# Altium PCB PCB-MAIN.PcbDoc (part 1 of 3)
Units mm, origin at the board's own origin, x right, y up, seen from the top; angles counter-clockwise.
Board outline 110 x 75 mm, 6 copper layers (F.Cu, In1.Cu, In2.Cu, In3.Cu, In4.Cu, B.Cu); 251 components, 186 nets, 1143 pads, 304 vias.
Unrouted connection lines stored in the file: 421.
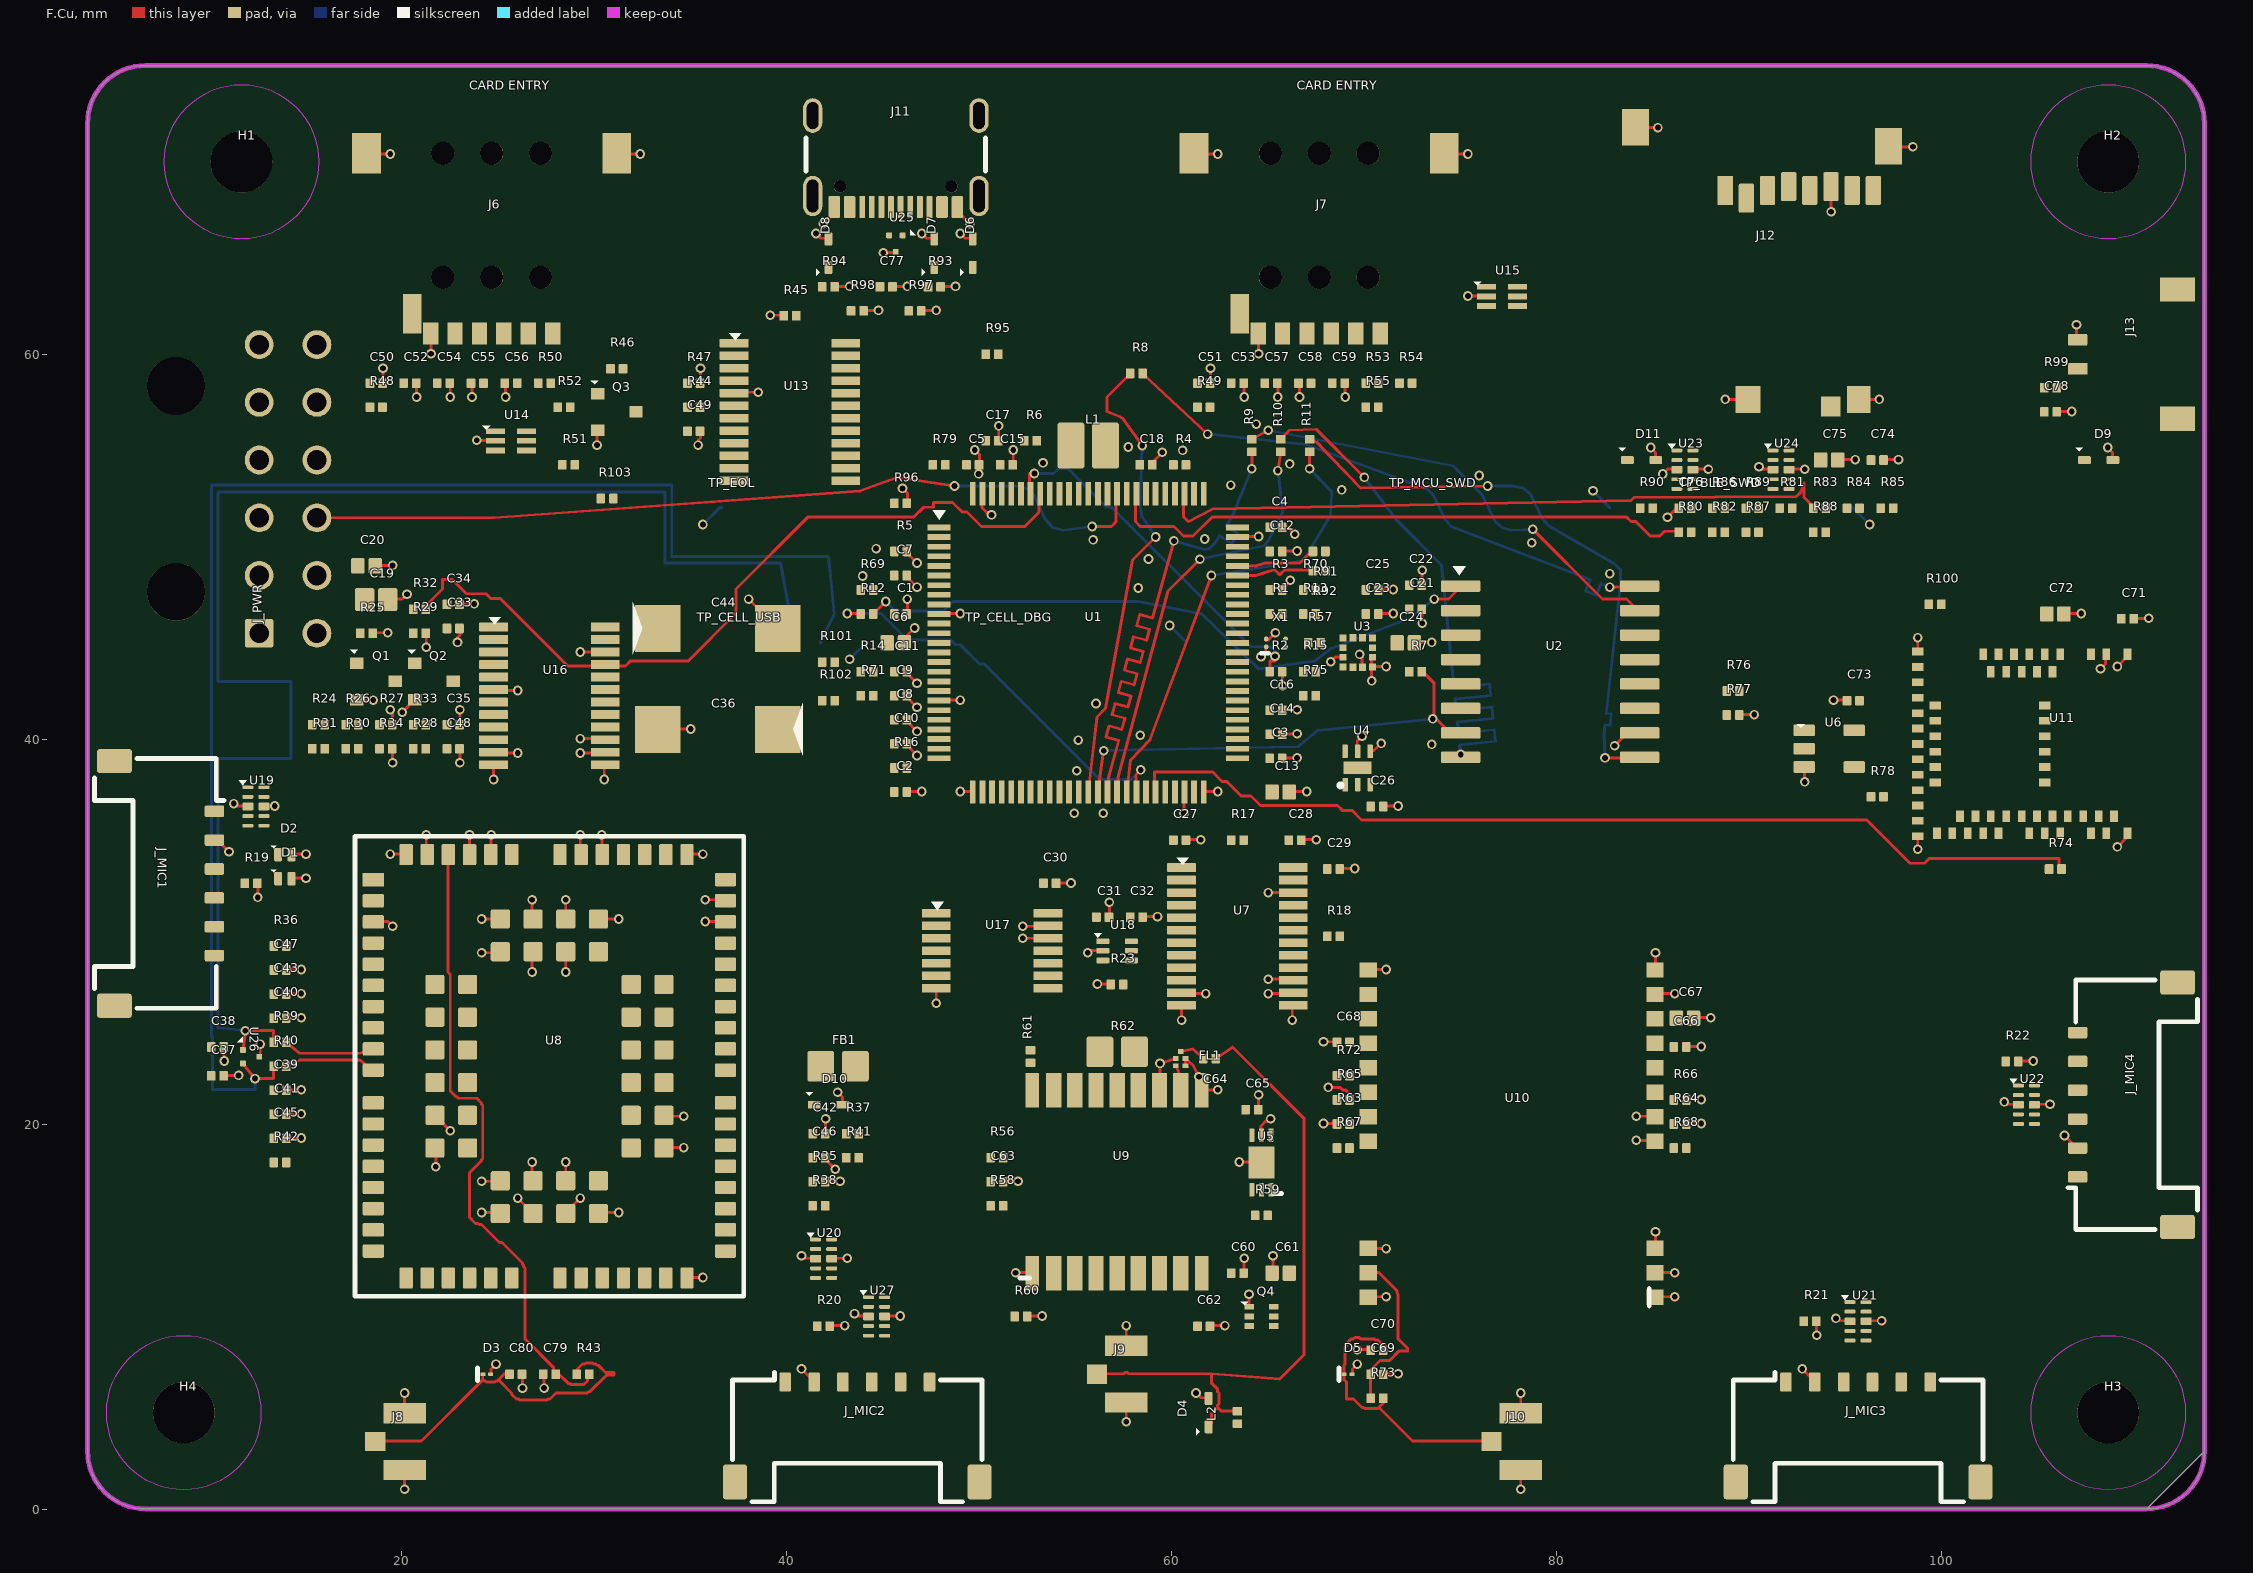
[diagram p0: F.Cu view]
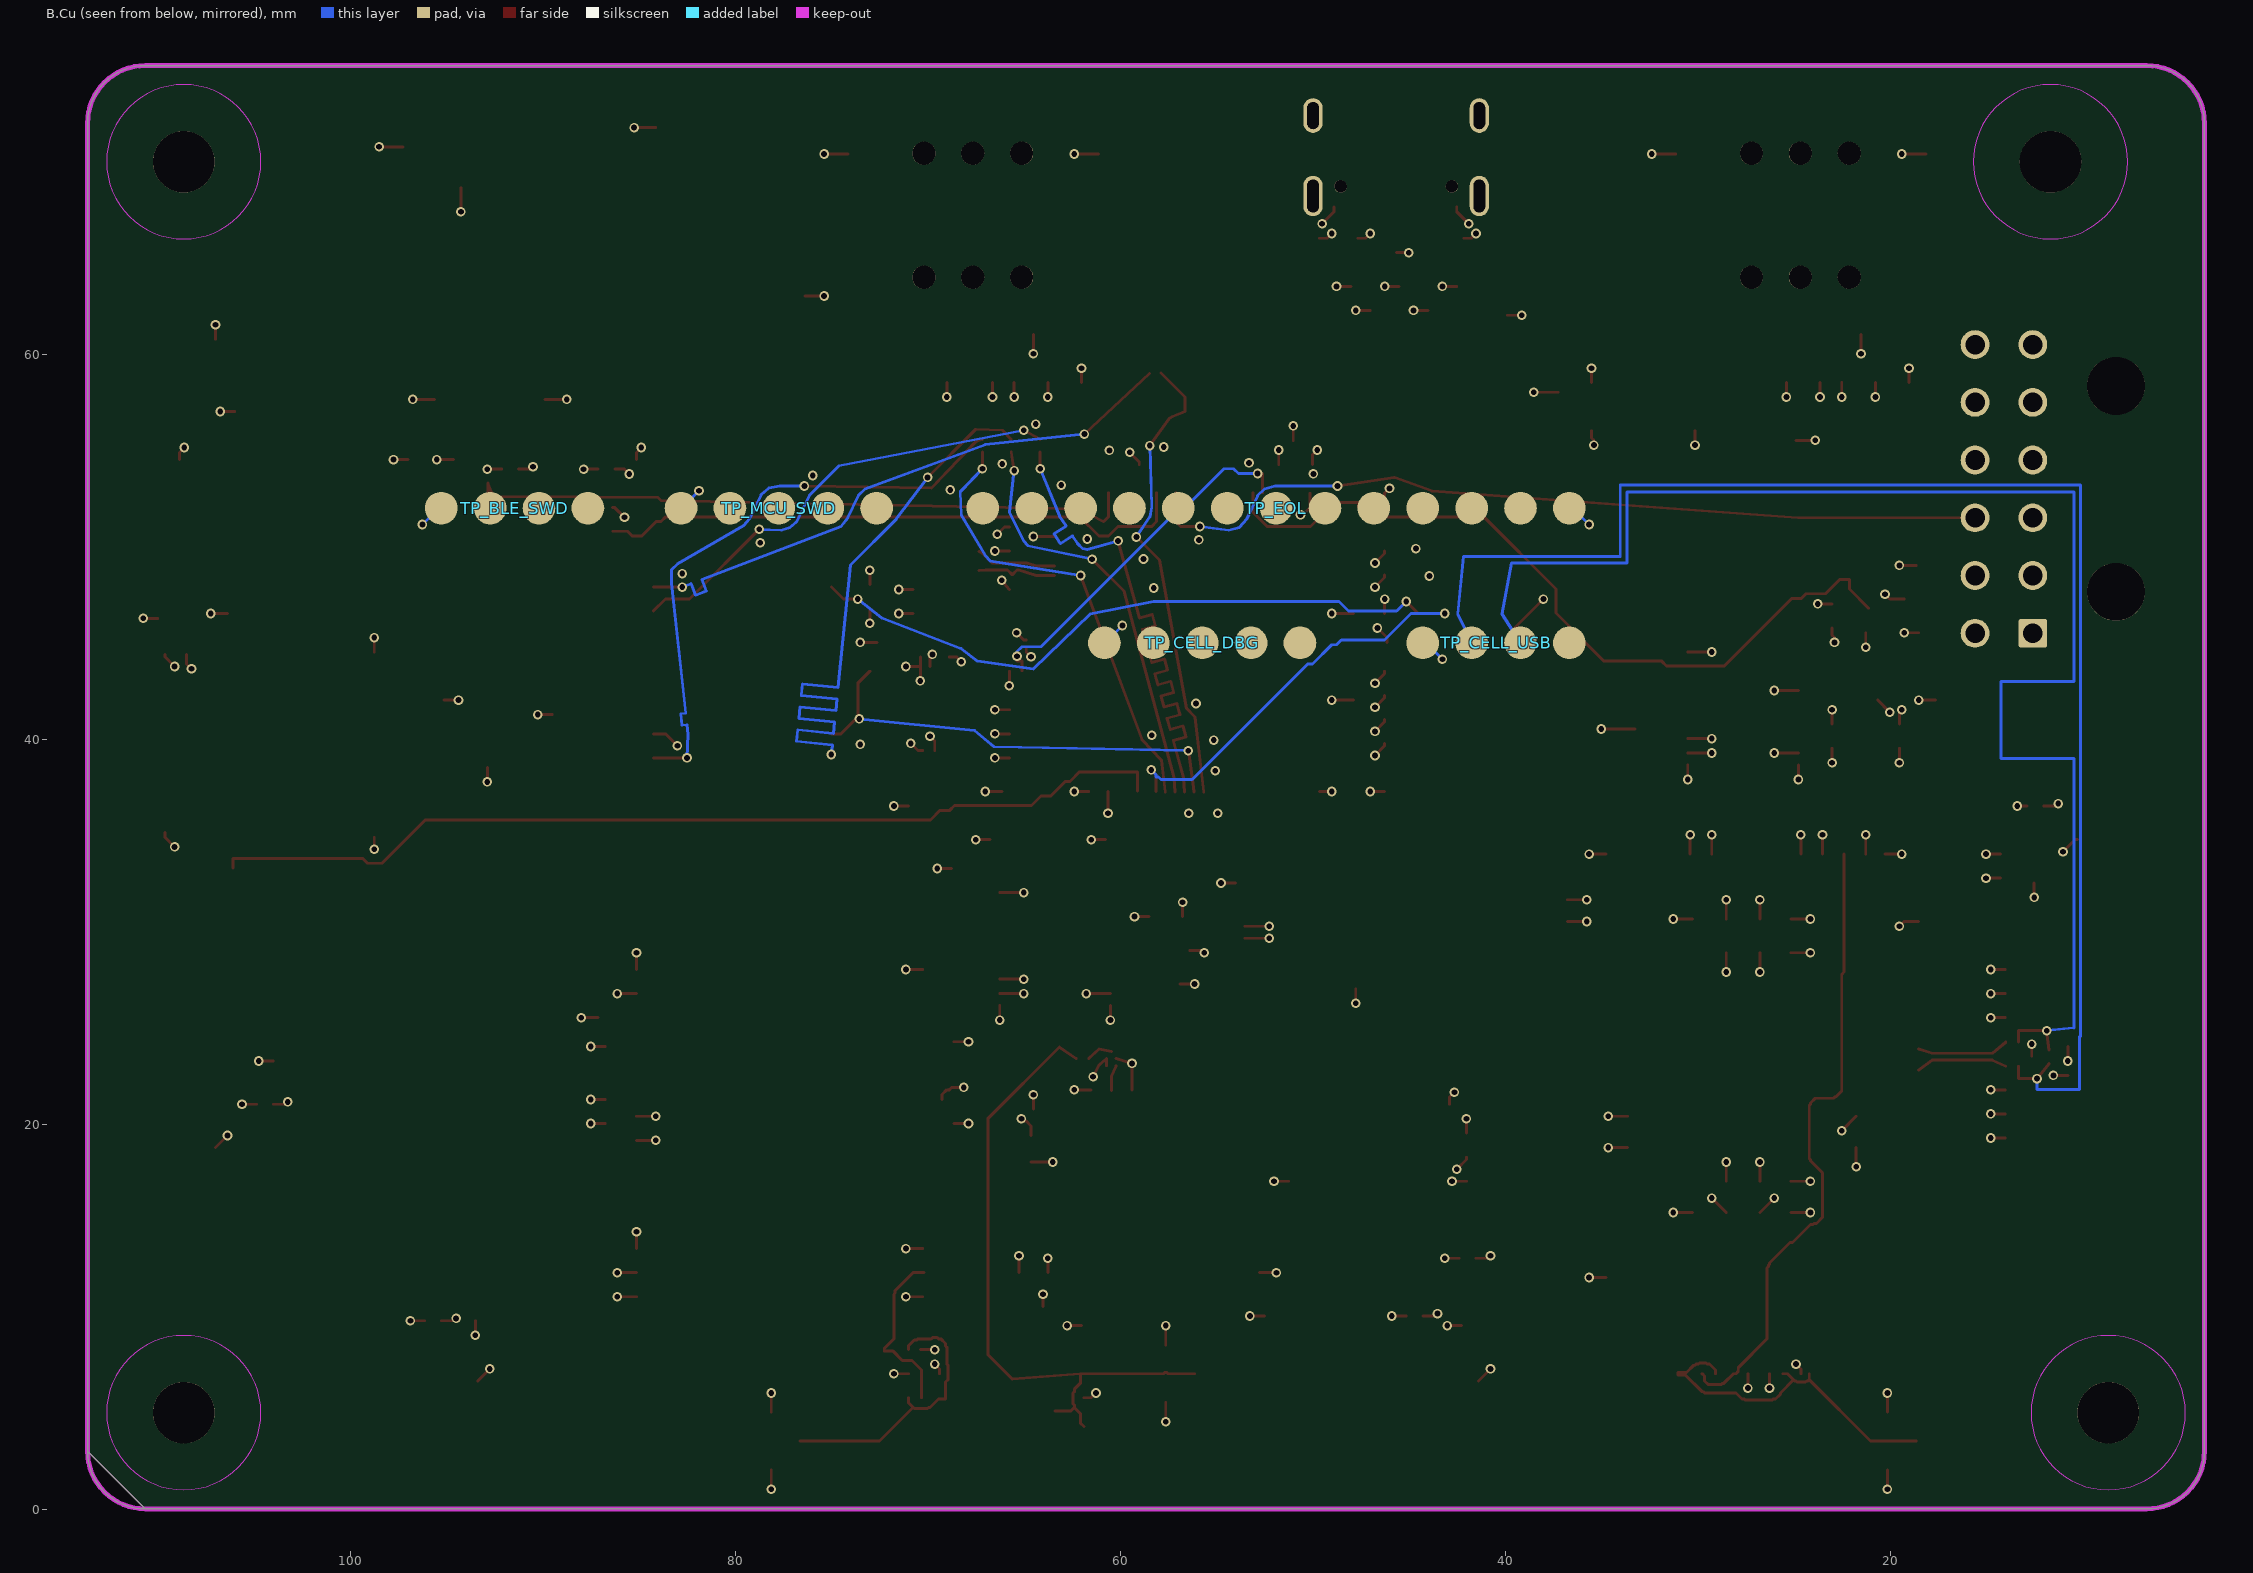
[diagram p1: B.Cu view, seen from below]
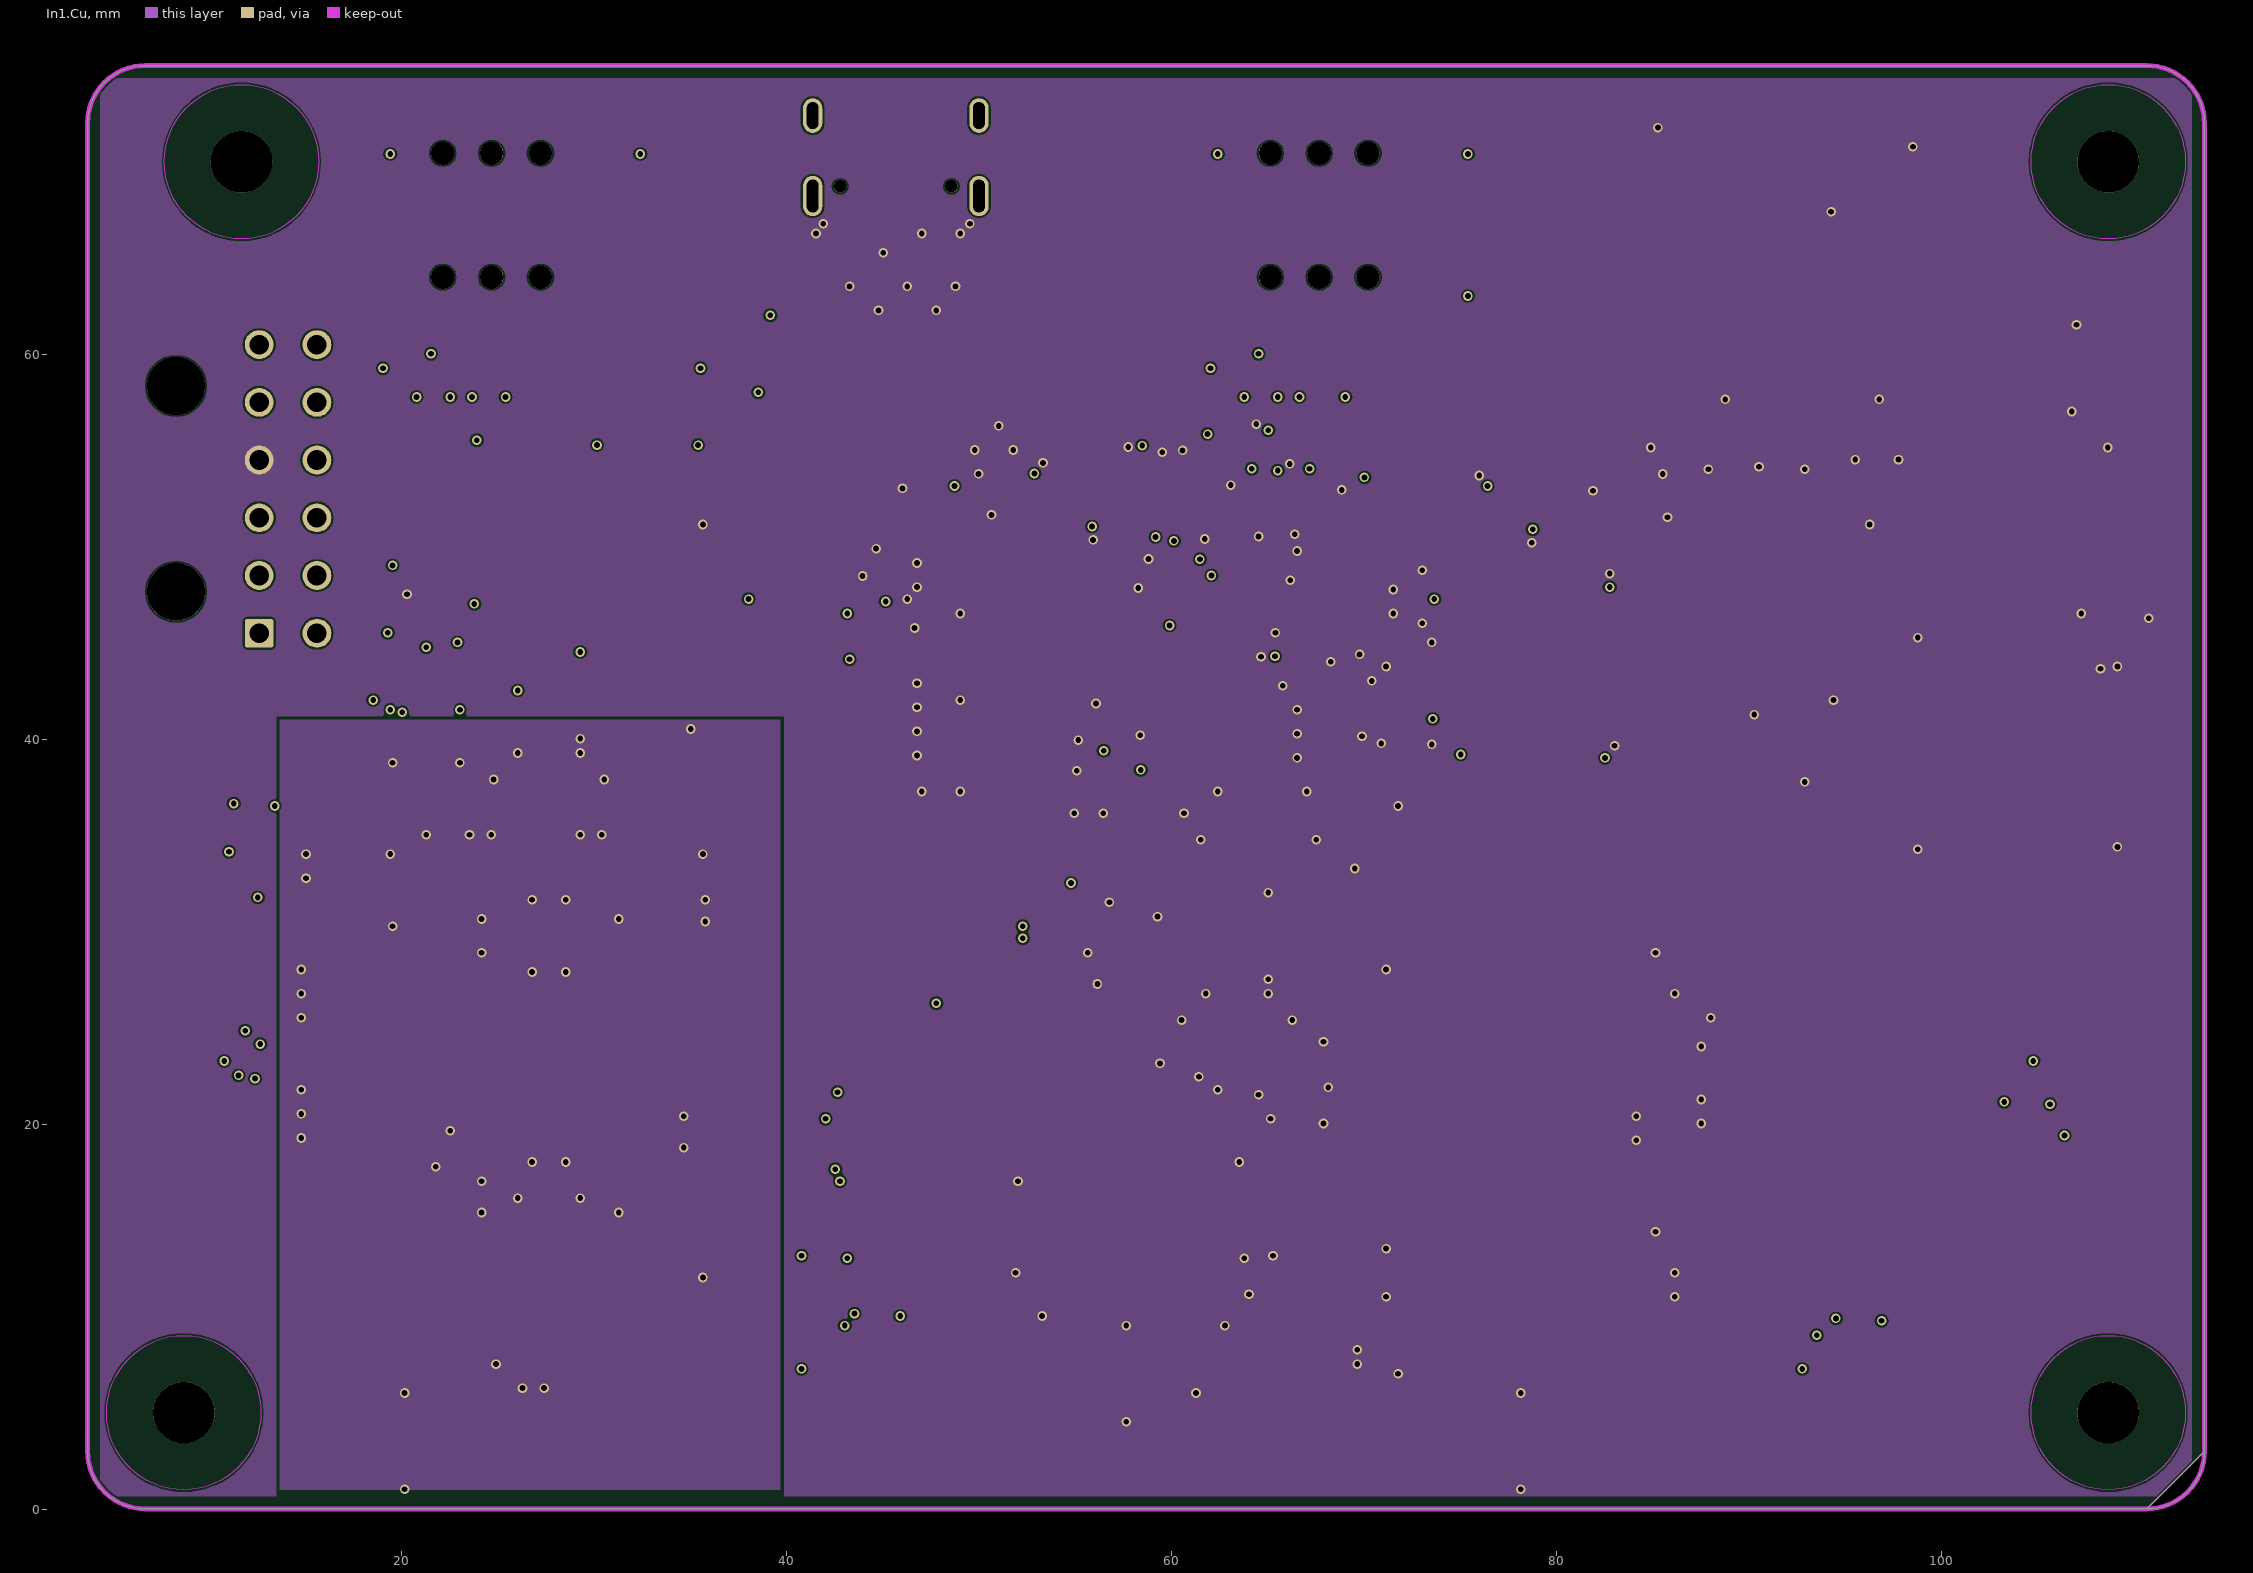
[diagram p2: In1.Cu]
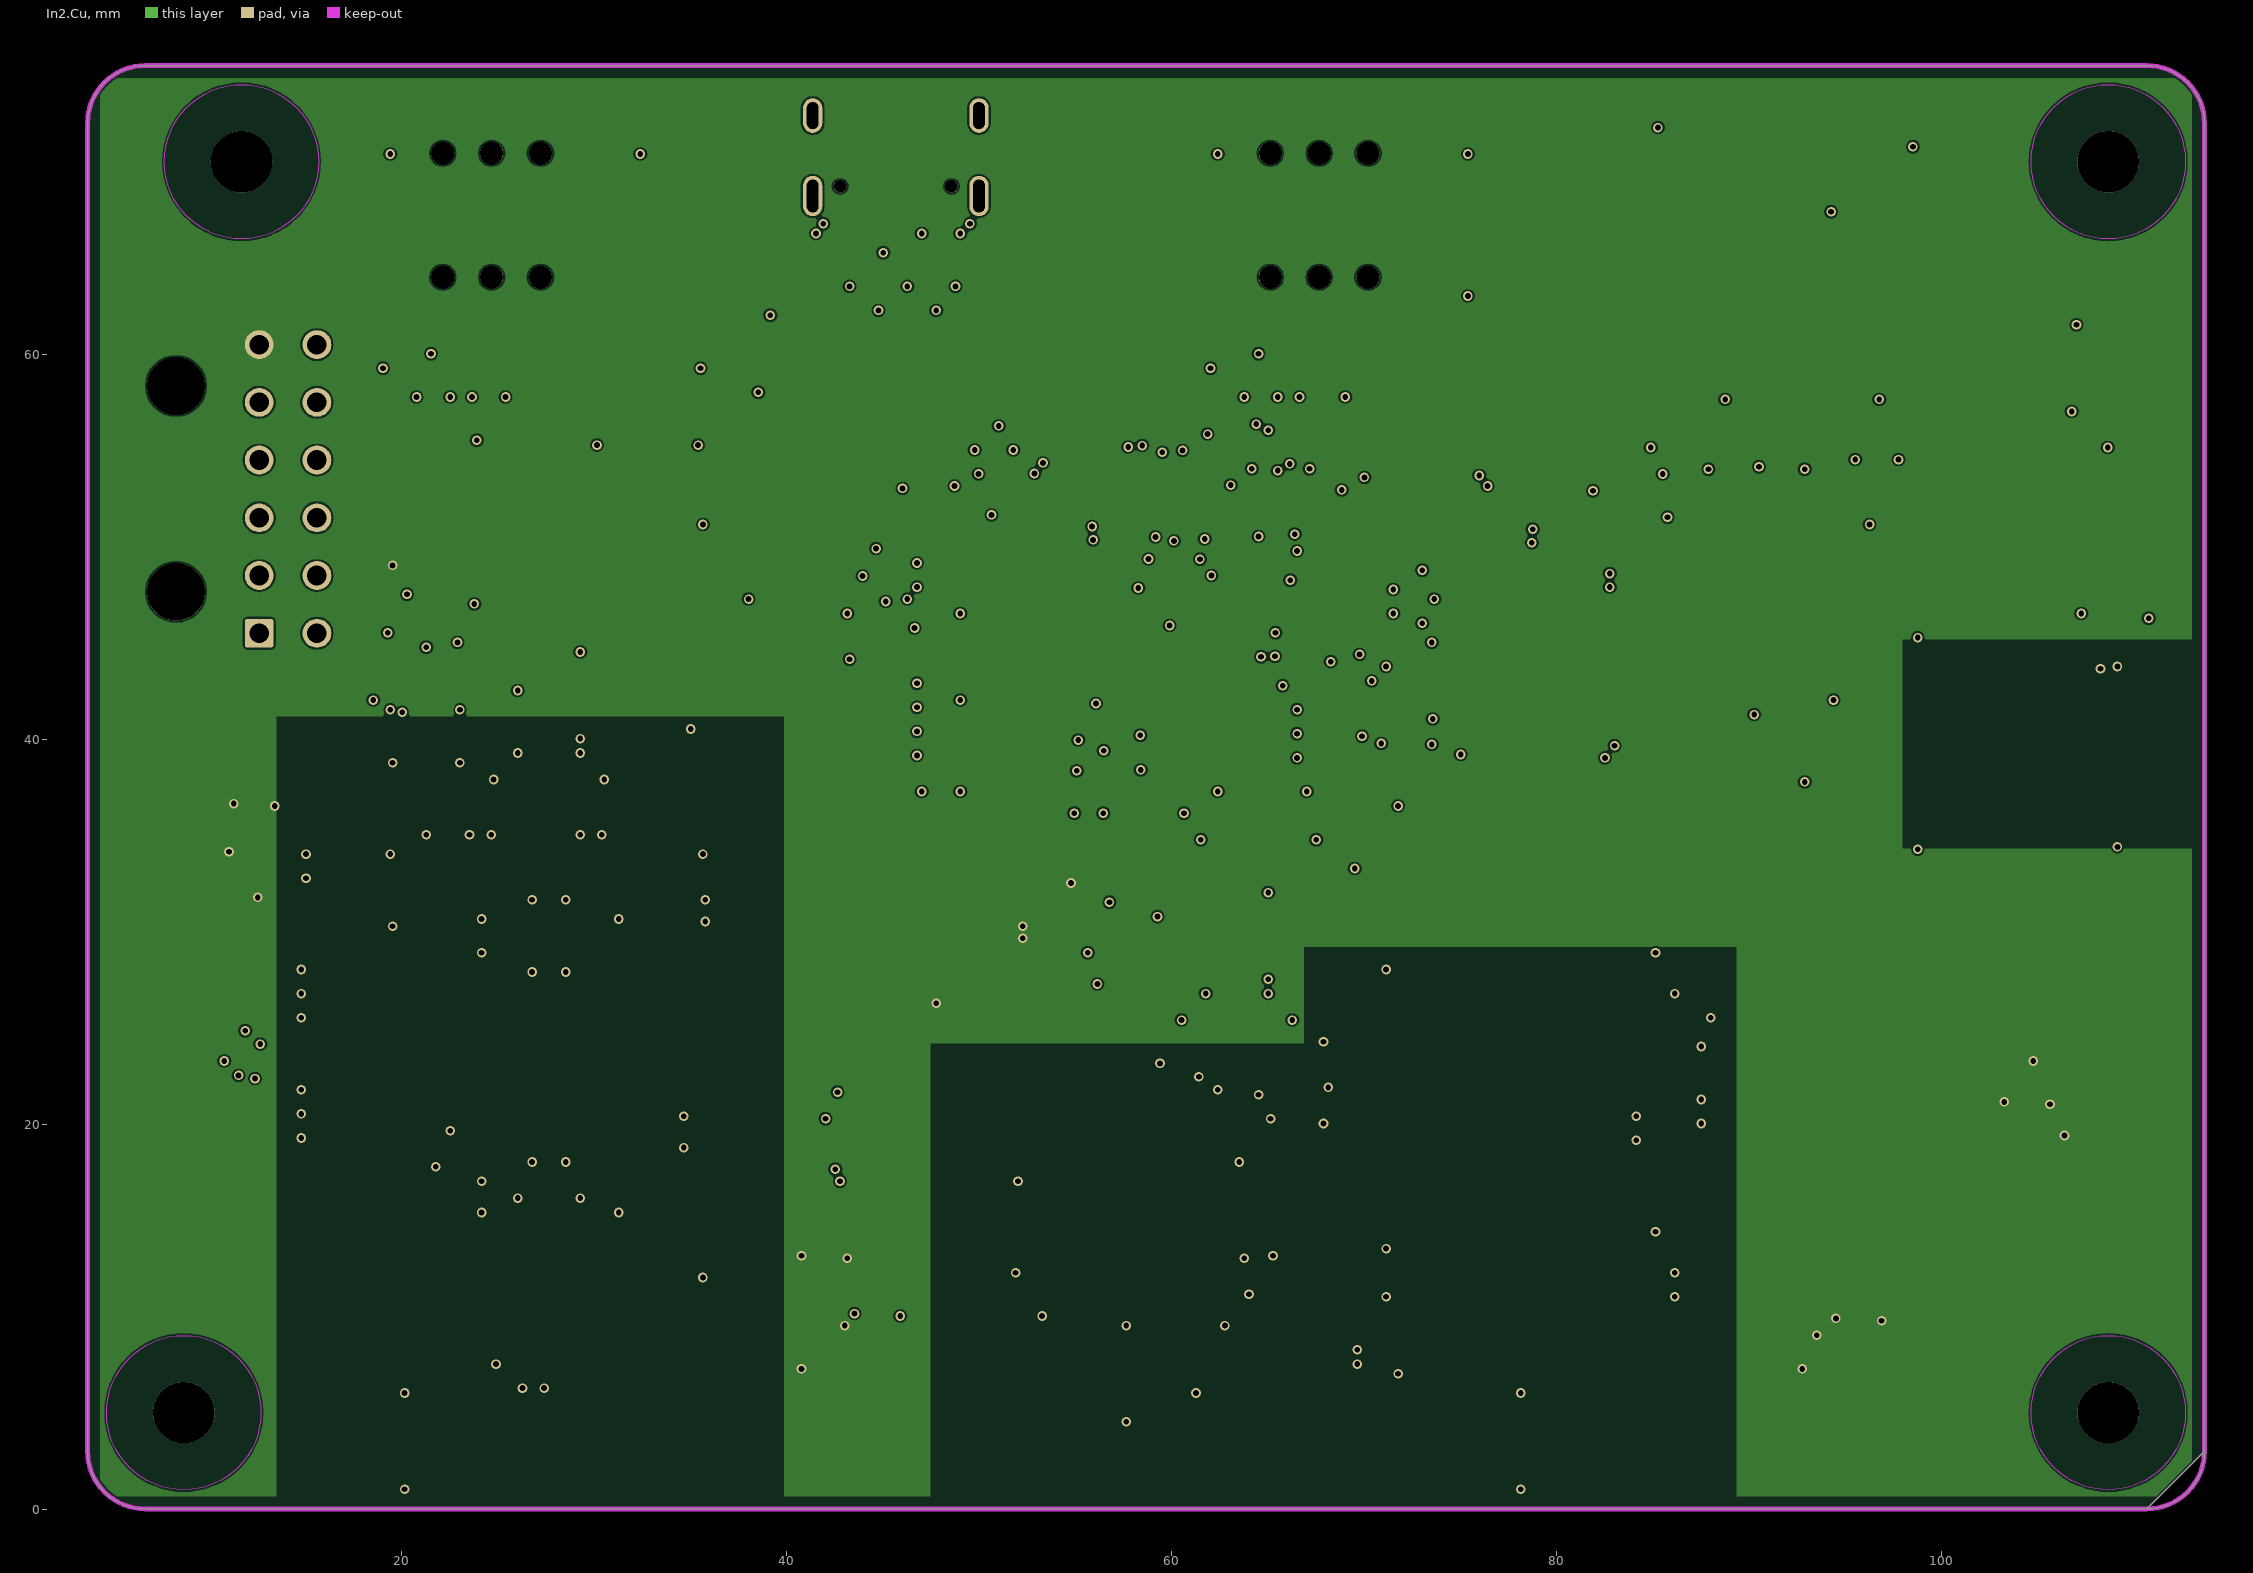
[diagram p3: In2.Cu]
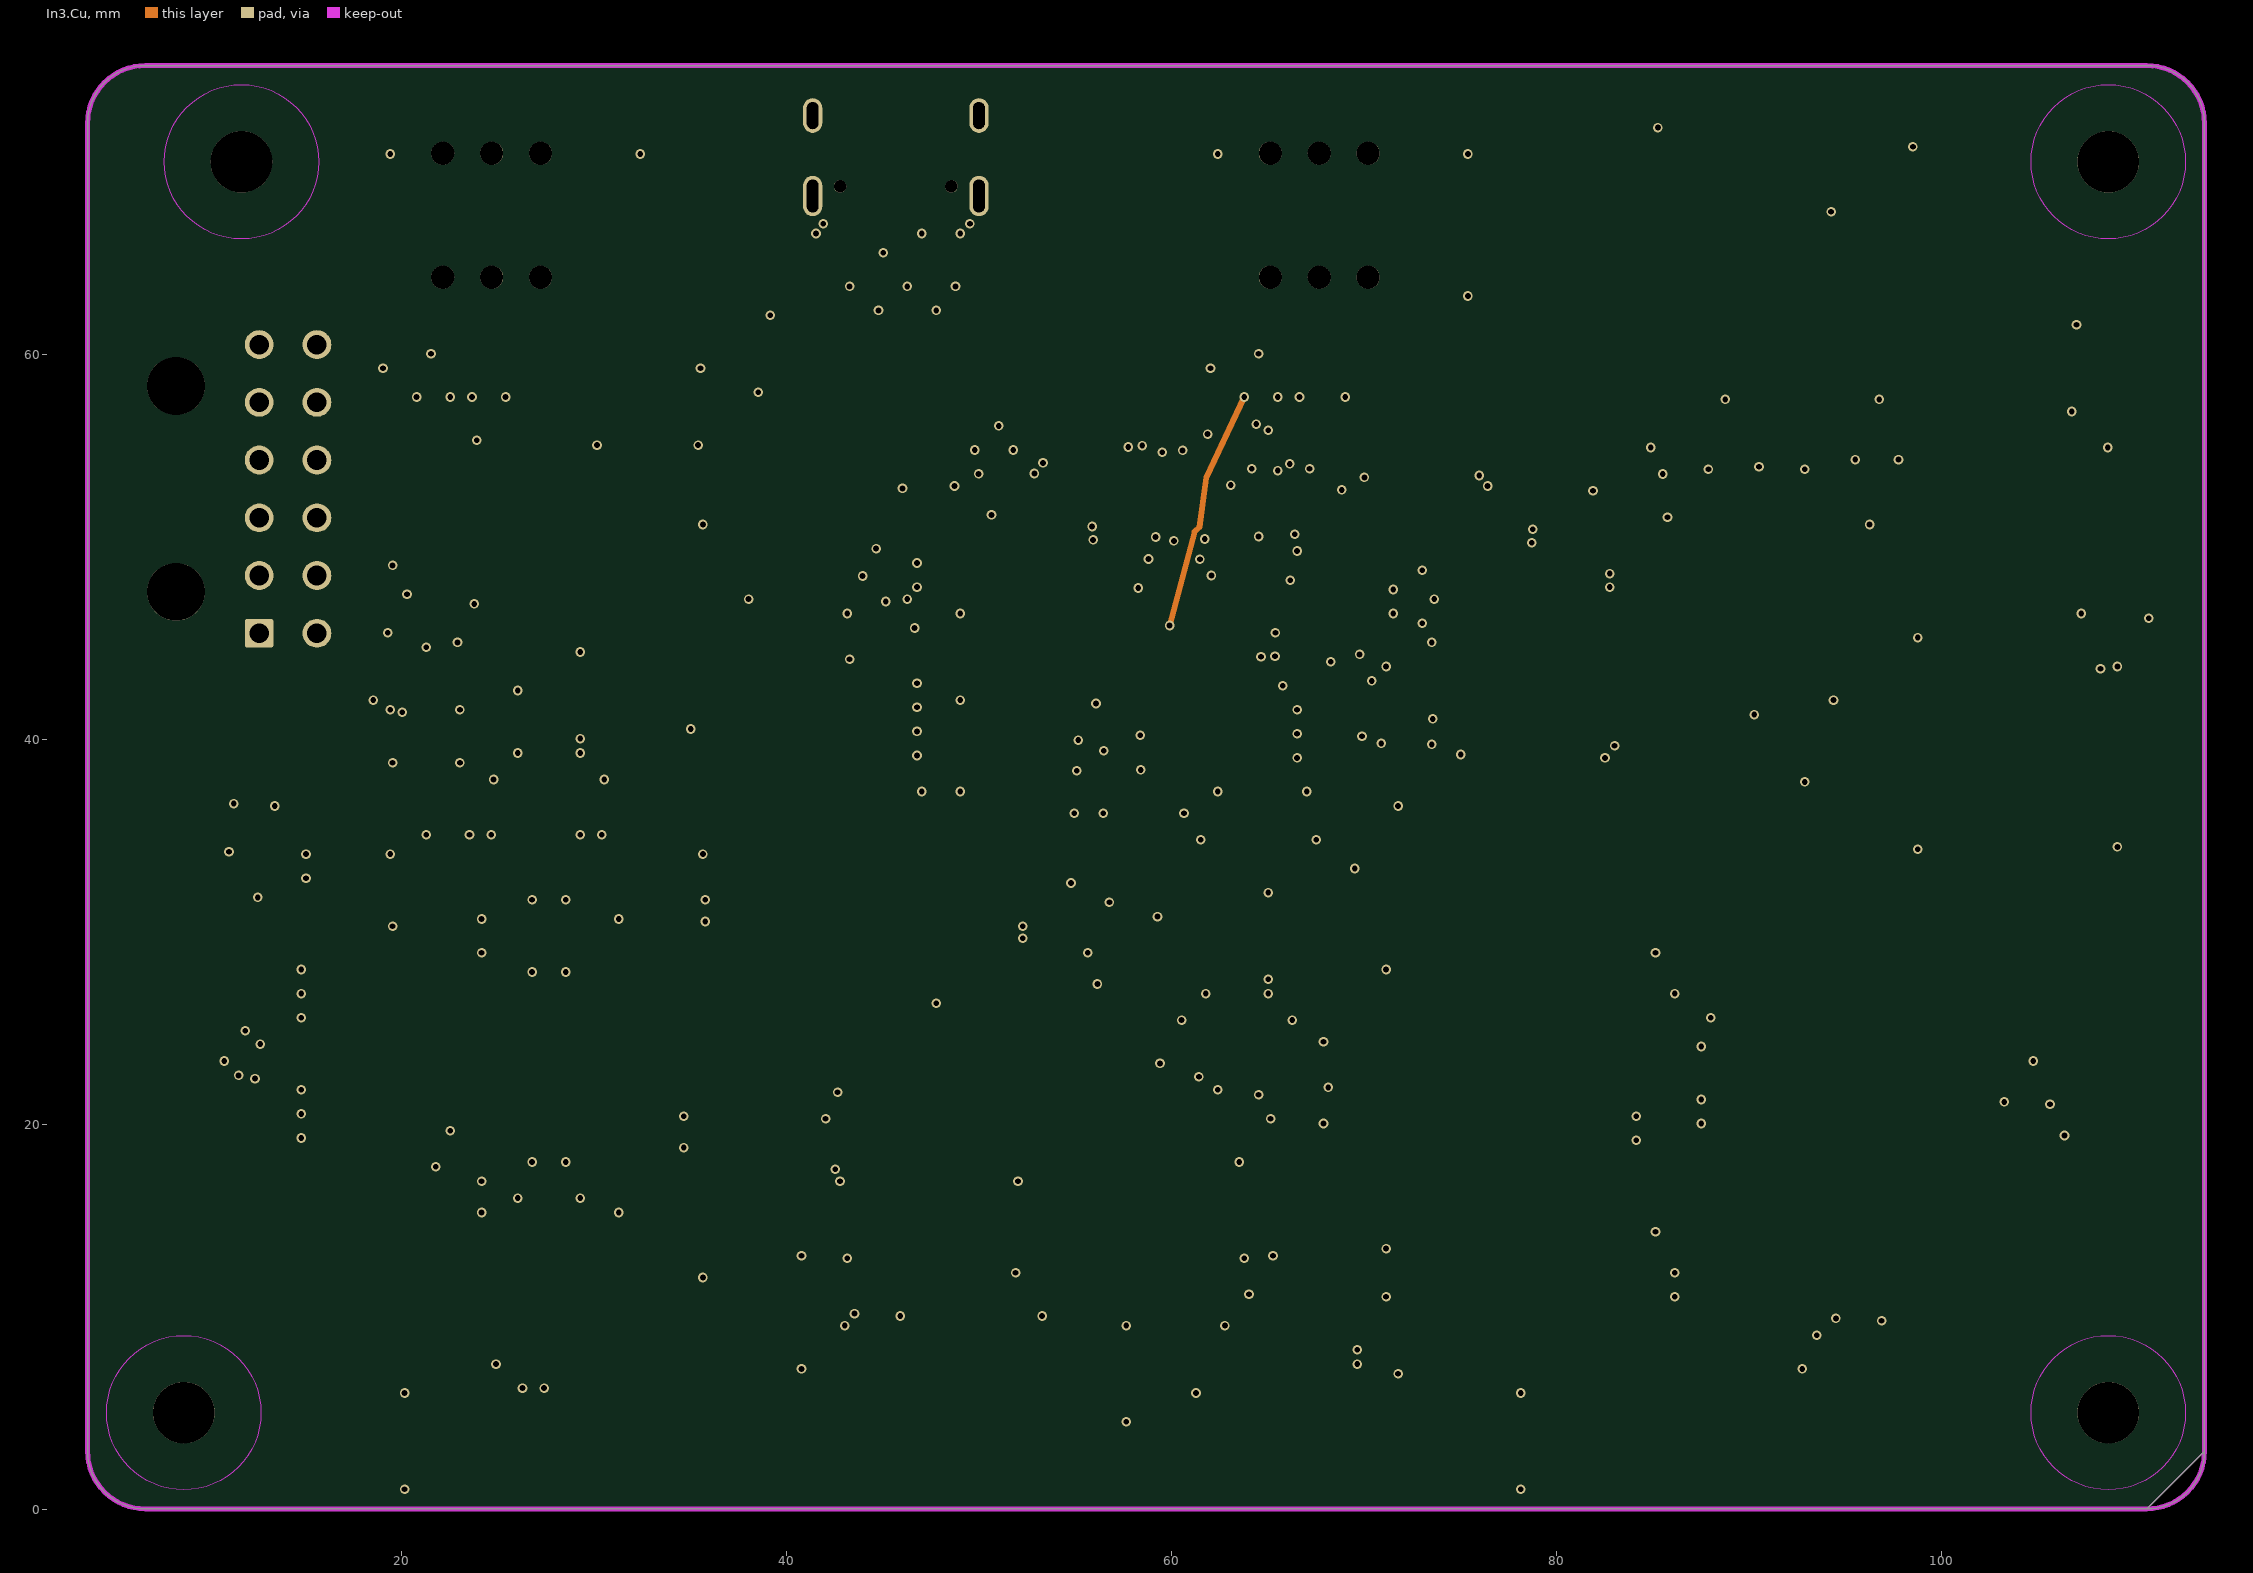
[diagram p4: In3.Cu]
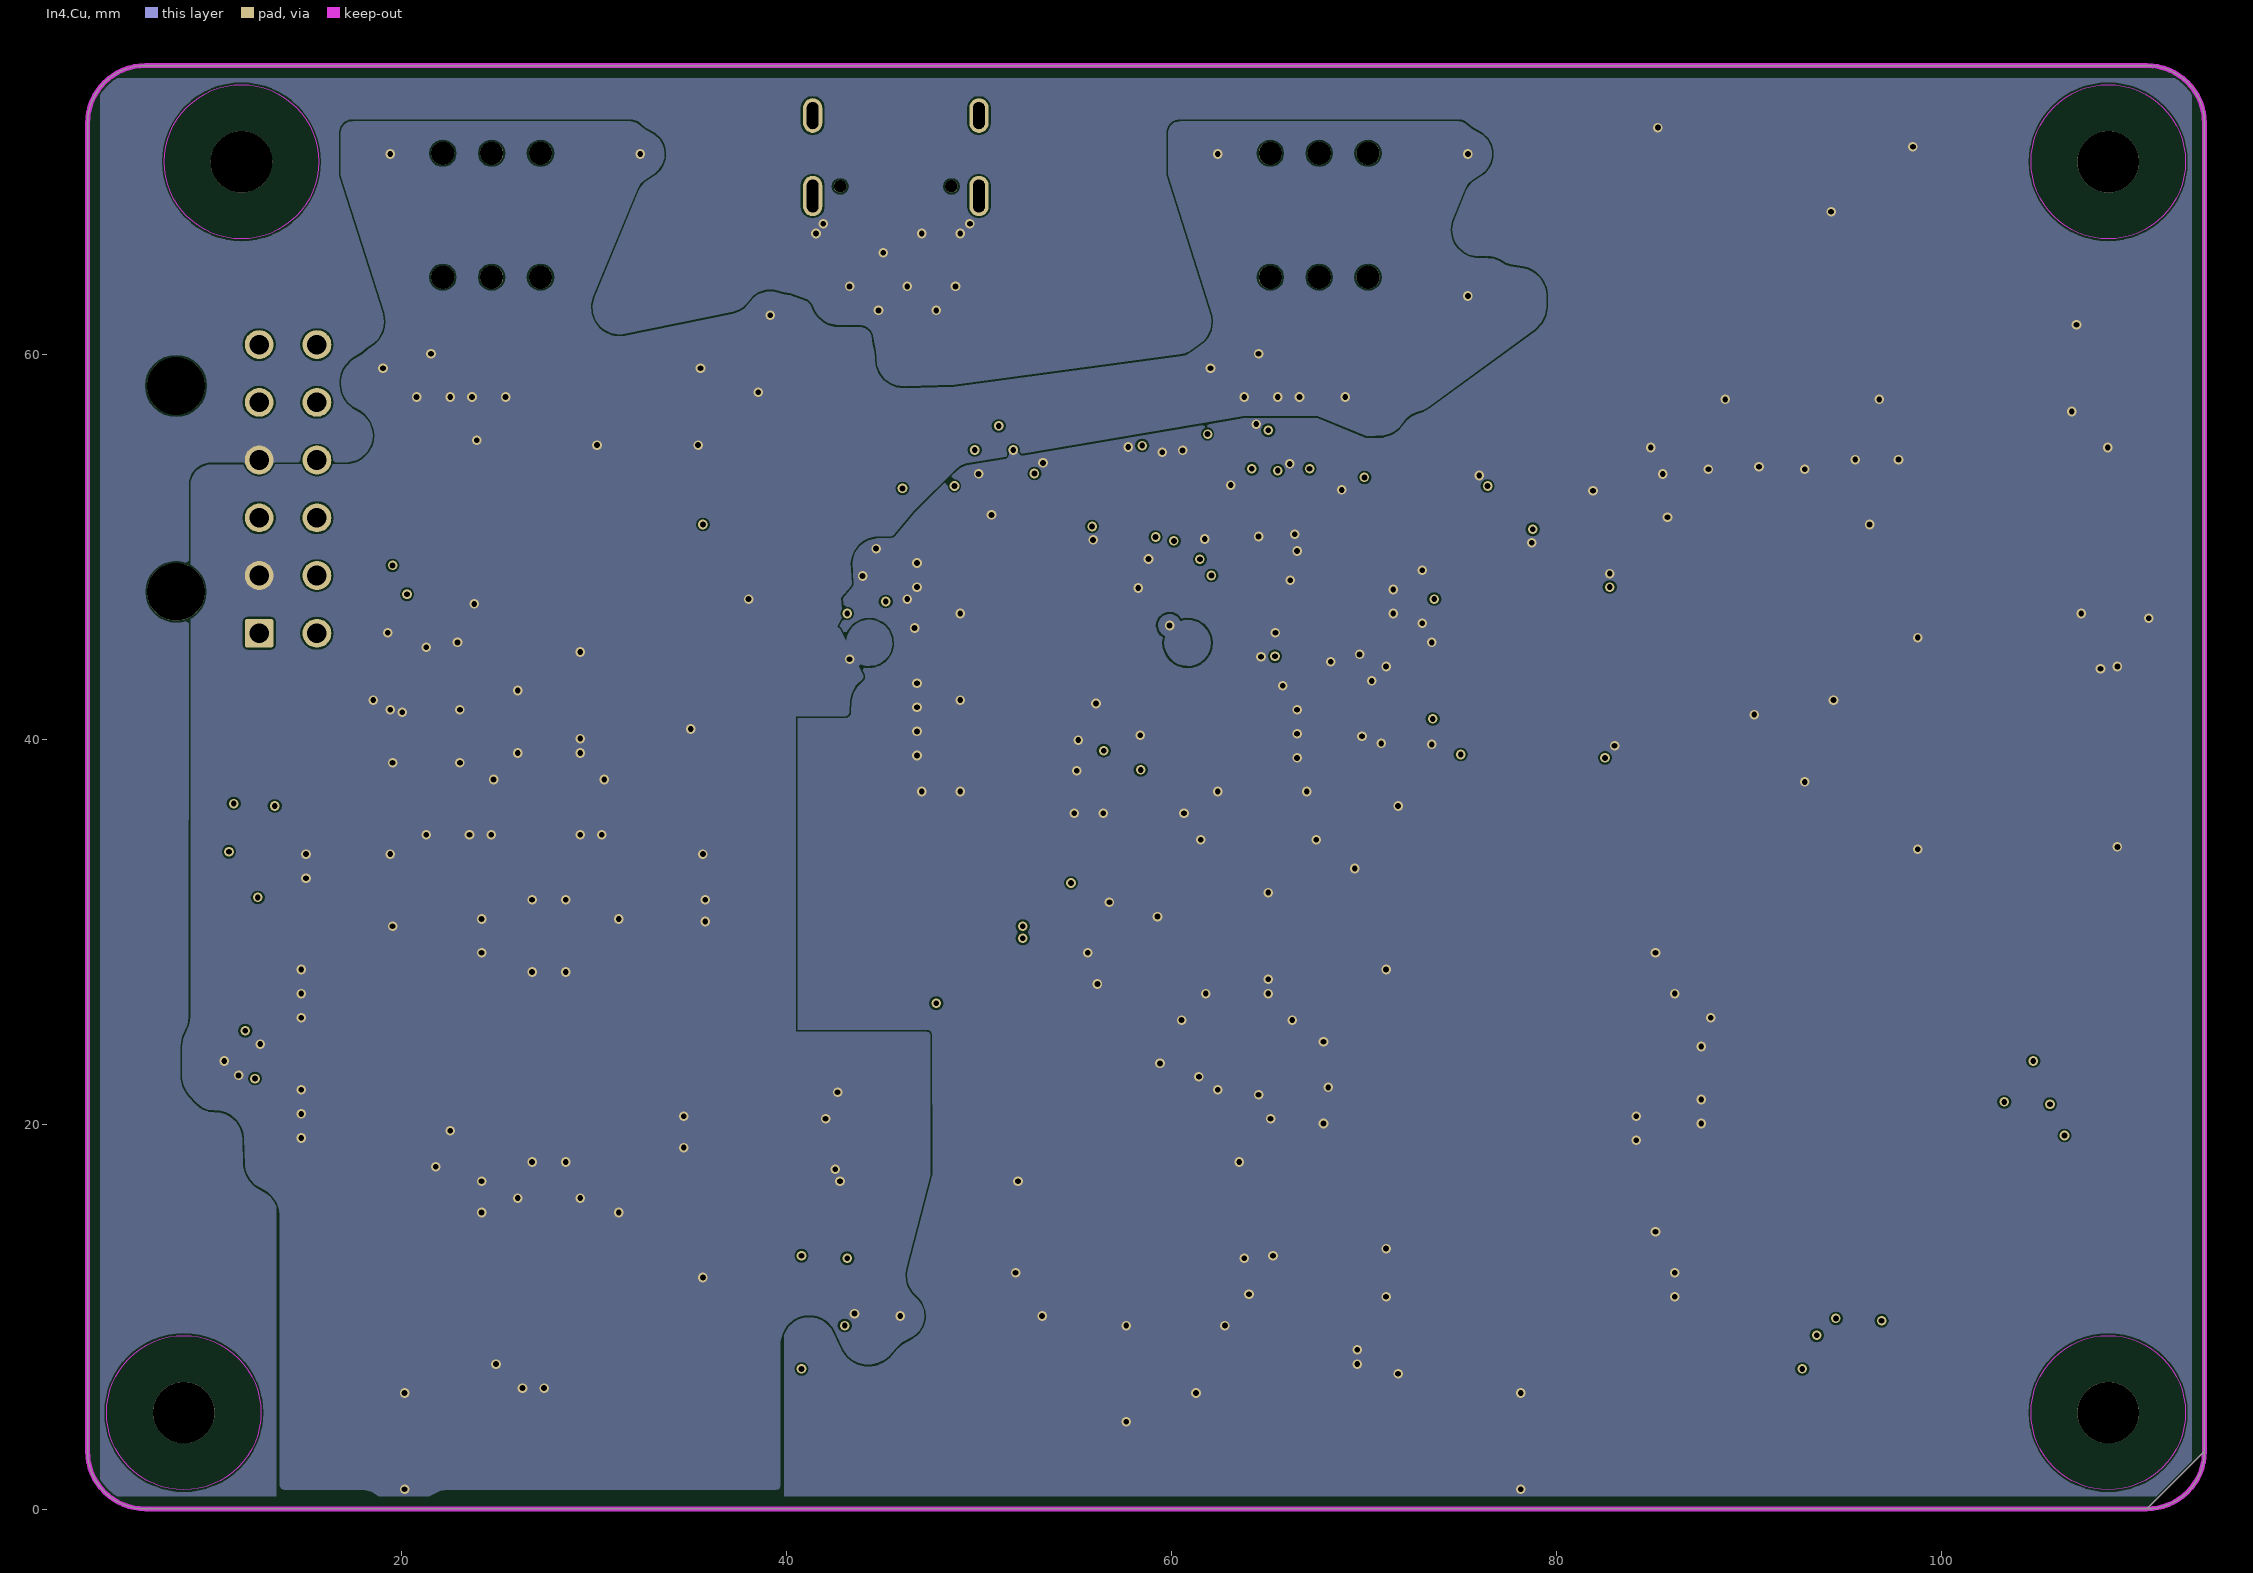
[diagram p5: In4.Cu]

## Layer stack, top to bottom
F.Mask: solder mask 0.0102, Solder Resist, Dk 3.5
F.Cu: signal copper 0.0356
Dielectric 1: dielectric 0.32, FR-4, Dk 4.8
In1.Cu: signal copper 0.0356
Dielectric2: dielectric 0.32, FR-4, Dk 4.8
In2.Cu: signal copper 0.0356
Dielectric3: dielectric 0.32, FR-4, Dk 4.8
In3.Cu: signal copper 0.0356
Dielectric4: dielectric 0.32, FR-4, Dk 4.8
In4.Cu: signal copper 0.0356
Dielectric5: dielectric 0.32, FR-4, Dk 4.8
B.Cu: signal copper 0.0356
B.Mask: solder mask 0.0102, Solder Resist, Dk 3.5

## Board outline
113.685,3.025 cw(c110.684,3.026) 110.685,0.025 6.685,0.025 cw(c6.686,3.026) 3.685,3.025 3.685,72.025 cw(c6.686,72.024) 6.685,75.025 110.685,75.025 cw(c110.684,72.024) 113.685,72.025 113.685,3.025 cw(c110.684,3.026) 113.685,3.025

## Design rules (kind name [scope] priority, off if disabled: settings)
Clearance "Clearence 0,18_PadClass" [InPadClass('Pad Class Clearance 0,18')] p1: gap=0.18 ignorepadtopadclearanceinfootprint=FALSE
Clearance "Clearence 0,12_PadClass" [InPadClass('Pad Class Clearance 0,12')] p2: gap=0.12 ignorepadtopadclearanceinfootprint=FALSE
Clearance "Clearence 0,1_Polygon" [InNamedPolygon('In1.Cu-GND_DIGITAL') OR InNamedPolygon('In2.Cu-GND_MIC') OR InNamedPolygon('In4.Cu-GND_DIGITAL') OR InNamedPolygon('In4.Cu-GND_MODEM') OR InNamedPolygon('In4.Cu-GND_MODEM-1') OR InNamedPolygon('In1.Cu-GND_MODEM')] p3: gap=0.1 ignorepadtopadclearanceinfootprint=FALSE
Clearance "Clearence 0,1_PadClass" [InPadClass('Pad Class Clearance 0,1')] p4: gap=0.1 ignorepadtopadclearanceinfootprint=FALSE
Clearance "Clearence 0,05_PadClass" [InPadClass('Pad Class Clearance 0,05')] p5: gap=0.05 ignorepadtopadclearanceinfootprint=FALSE
MinimumSolderMaskSliver [All] p1: minsoldermaskwidth=0
PolygonConnect Polygon_In1.Cu-GND_MODEM_ConnectDirect [IsNamedPolygon('In1.Cu-GND_MODEM')] p1: connectstyle=Direct reliefconductorwidth=0.254 reliefentries=4 polygonreliefangle="90 Angle" airgapwidth=0.254
PolygonConnect Polygon_In4.Cu-GND_MODEM-1_ConnectDirect [IsNamedPolygon('In4.Cu-GND_MODEM-1')] p2: connectstyle=Direct reliefconductorwidth=0.254 reliefentries=4 polygonreliefangle="90 Angle" airgapwidth=0.254
PolygonConnect Polygon_In4.Cu-GND_MODEM_ConnectDirect [IsNamedPolygon('In4.Cu-GND_MODEM')] p3: connectstyle=Direct reliefconductorwidth=0.254 reliefentries=4 polygonreliefangle="90 Angle" airgapwidth=0.254
PolygonConnect Polygon_In4.Cu-GND_DIGITAL_ConnectDirect [IsNamedPolygon('In4.Cu-GND_DIGITAL')] p4: connectstyle=Direct reliefconductorwidth=0.254 reliefentries=4 polygonreliefangle="90 Angle" airgapwidth=0.254
PolygonConnect Polygon_In2.Cu-GND_MIC_ConnectDirect [IsNamedPolygon('In2.Cu-GND_MIC')] p5: connectstyle=Direct reliefconductorwidth=0.254 reliefentries=4 polygonreliefangle="90 Angle" airgapwidth=0.254
PolygonConnect Polygon_In1.Cu-GND_DIGITAL_ConnectDirect [IsNamedPolygon('In1.Cu-GND_DIGITAL')] p6: connectstyle=Direct reliefconductorwidth=0.254 reliefentries=4 polygonreliefangle="90 Angle" airgapwidth=0.254
RoutingVias [All] p1: holewidth=0.711 width=1.27 viastyle="Through Hole" minholewidth=0.711 minwidth=1.27 maxholewidth=0.711 maxwidth=1.27
SilkToSilkClearance [All] p1: silktosilkclearance=0
SilkToSolderMaskClearance [IsPad] p1: minsilkscreentomaskgap=0 clearancetoexposedcopper=TRUE
SolderMaskExpansion [All] p1: expansion=0 istentingtop=FALSE
Width [All] p1: maxlimit=10 minlimit=0.254 preferedwidth=0.254 minimp=50.000000 maximp=50.000000 favimp=50.000000
27 further rules are at their usual default settings.

## Classes and differential pairs
pad class "Pad Class Clearance 0,18": U4-1 U4-2 U4-3 U4-4 U4-5 U4-6 U4-EP
pad class "Pad Class Clearance 0,12": U3-1 U3-2 U3-3 U3-4 U3-5 U3-6 U3-7 U3-8 U3-9 U3-10 U3-11 U3-12 X1-1 X1-2 X1-3 X1-4
pad class "Pad Class Clearance 0,1": D3-1 D3-2 D5-1 D5-2
pad class "Pad Class Clearance 0,05": FL1-A FL1-B FL1-C FL1-D FL1-E J6-1 J6-2 J6-3 J6-4 J6-5 J6-6 J6-7 J6-SHIELD J6-Un1 J6-Un2 J6-Un3 J6-Un4 J6-Un5 J6-Un6 J7-1 J7-2 J7-3 J7-4 J7-5 J7-6 J7-7 J7-SHIELD J7-Un1 J7-Un2 J7-Un3 J7-Un4 J7-Un5 J7-Un6

## Components (designator, comment, footprint, x,y, rotation, side; value= is the part's Value field where it differs from the comment)
C1 "GRM155R71E104KE14D" ?#1 45.935,46.525 r0 top
C2 "GRM155R71E104KE14D" ?#1 45.935,37.275 r0 top
C3 "GRM155R71E104KE14D" ?#1 65.435,39.025 r0 top
C4 "GRM155R71E104KE14D" ?#1 65.435,51.025 r0 top
C5 "GRM155R71E104KE14D" ?#1 49.685,54.275 r0 top
C6 "GRM188R61A106KE69D" ?#2 45.685,45.025 r0 top
C7 "GRM155R71E104KE14D" ?#1 45.935,48.525 r0 top
C8 "GRM155R71E104KE14D" ?#1 45.935,41.025 r0 top
C9 "GRM155R61C105KA12D" ?#1 45.935,42.275 r0 top
C10 "GRM155R71E104KE14D" ?#1 45.935,39.775 r0 top
C11 "GRM155R61C105KA12D" ?#1 45.935,43.525 r0 top
C12 "GRM155R71E104KE14D" ?#1 65.435,49.775 r0 top
C13 "GRM188R61A106KE69D" ?#2 65.685,37.275 r0 top
C14 "GRM155R61A225KE15D" ?#1 65.435,40.275 r0 top
C15 "GRM155R61A225KE15D" ?#1 51.435,54.275 r0 top
C16 "GRM155R71E104KE14D" ?#1 65.435,41.525 r0 top
C17 "GRM155R71E104KE14D" ?#1 50.685,55.525 r0 top
C18 "GRM155R71E104KE14D" ?#1 58.685,54.275 r0 top
C19 "GRM21BR61A226ME44L" ?#3 18.685,47.275 r0 top
C20 "GRM188R61A106KE69D" ?#2 18.185,49.025 r0 top
C21 "GRM155R71E104KE14D" ?#1 72.685,46.775 r0 top
C22 "GRM155R61C105KA12D" ?#1 72.685,48.025 r0 top
C23 "GRM155R71E104KE14D" ?#1 70.435,46.525 r0 top
C24 "GRM188R61A106KE69D" ?#2 72.185,45.025 r0 top
C25 "GRM155R71E104KE14D" ?#1 70.435,47.775 r0 top
C26 "GRM155R71E104KE14D" ?#1 70.685,36.525 r0 top
C27 "GRM155R71E104KE14D" ?#1 60.435,34.775 r0 top
C28 "GRM155R71E104KE14D" ?#1 66.435,34.775 r0 top
C29 "GRM155R71E104KE14D" ?#1 68.435,33.275 r0 top
C30 "GRM155R71E104KE14D" ?#1 53.685,32.525 r0 top
C31 "GRM155R71E104KE14D" ?#1 56.435,30.775 r0 top
C32 "GRM155R71E104KE14D" ?#1 58.185,30.775 r0 top
C33 "GRM155R71E104KE14D" ?#1 22.685,45.775 r0 top
C34 "GRM155R71E104KE14D" ?#1 22.685,47.025 r0 top
C35 "GRM155R71E104KE14D" ?#1 22.685,40.775 r0 top
C36 "T520D107M006ATE015" KEMET_T52X_D_7343-31_DensityB 36.435,40.525 r180 top
C37 "GRM155R71E224KE14D" ?#1 10.435,22.525 r0 top
C38 "GRM155R71E473KA01D" ?#1 10.435,24.025 r0 top
C39 "GRM1555C1H151JA01D" ?#1 13.685,21.775 r0 top
C40 "GRM1555C1H101JA01D" ?#1 13.685,25.525 r0 top
C41 "GRM1555C1H680JA01D" ?#1 13.685,20.525 r0 top
C42 "GRM1555C1H330JA01D" ?#1 41.685,19.525 r0 top
C43 "GRM1555C1H100JA01D" ?#1 13.685,26.775 r0 top
C44 "T520D107M006ATE015" KEMET_T52X_D_7343-31_DensityB 36.435,45.775 r0 top
C45 "GRM155R71E104KE14D" ?#1 13.685,19.275 r0 top
C46 "GRM1555C1H330JA01D" ?#1 41.685,18.275 r0 top
C47 "GRM1555C1H100JA01D" ?#1 13.685,28.025 r0 top
C48 "GRM155R71E103KA01D" ?#1 22.685,39.525 r0 top
C49 "GRM155R71E104KE14D" ?#1 35.185,56.025 r0 top
C50 "GRM155R71E104KE14D" ?#1 18.685,58.525 r0 top
C51 "GRM155R71E104KE14D" ?#1 61.685,58.525 r0 top
C52 "GRM155R71E103KA01D" ?#1 20.435,58.525 r0 top
C53 "GRM155R71E103KA01D" ?#1 63.435,58.525 r0 top
C54 "GRM1555C1H330JA01D" ?#1 22.185,58.525 r0 top
C55 "GRM1555C1H330JA01D" ?#1 23.935,58.525 r180 top
C56 "GRM1555C1H330JA01D" ?#1 25.685,58.525 r180 top
C57 "GRM1555C1H330JA01D" ?#1 65.185,58.525 r0 top
C58 "GRM1555C1H330JA01D" ?#1 66.935,58.525 r180 top
C59 "GRM1555C1H330JA01D" ?#1 68.685,58.525 r0 top
C60 "GRM155R71E104KE14D" ?#1 63.435,12.275 r0 top
C61 "GRM188R61A106KE69D" ?#2 65.685,12.275 r180 top
C62 "GRM155R71E104KE14D" ?#1 61.685,9.525 r0 top
C63 "GRM155R71C103KA01D" ?#1 50.935,17.025 r0 top
C64 "GRM1555C1E470JA01D" ?#1 61.985,23.425 r180 top
C65 "GRM155R71E104KE14D" ?#1 64.185,20.775 r0 top
C66 "GRM155R71E104KE14D" ?#1 86.435,24.025 r0 top
C67 "GRM188R61A106KE69D" ?#2 86.685,25.525 r0 top
C68 "GRM155R71E104KE14D" ?#1 68.935,24.275 r180 top
C69 "GRM1555C1H100JA01D" ?#1 70.685,7.025 r0 top
C70 "GRM1555C1H100JA01D" ?#1 70.685,8.275 r180 top
C71 "GRM155R71E104KE14D" ?#1 109.685,46.275 r0 top
C72 "GRM188R61A106KE69D" ?#2 105.935,46.525 r0 top
C73 "GRM155R71E104KE14D" ?#1 95.435,42.025 r180 top
C74 "GRM155R71E104KE14D" ?#1 96.685,54.525 r0 top
C75 "GRM188R61A106KE69D" ?#2 94.185,54.525 r0 top
C76 "GRM155R71E103KA01D" ?#1 86.685,52.025 r180 top
C77 "GRM155R72A472KA01D" ?#1 45.185,63.525 r0 top
C78 "GRM155R71E103KA01D" ?#1 105.685,57.025 r0 top
C79 "GRM1555C1H100JA01D" ?#1 27.685,7.025 r180 top
C80 "GRM1555C1H100JA01D" ?#1 25.935,7.025 r0 top
D1 "PESD5V0S1UL" Nexperia_PESD5V0S1UL_SOD882 13.935,32.775 r0 top
D2 "PESD5V0S1UL" Nexperia_PESD5V0S1UL_SOD882 13.935,34.025 r0 top
D3 "PESD5V0C1BSF" PESD5V0C1BSF_SOD962-2 24.435,7.025 r0 top
D4 "TPD1E05U06DYAR" TI_DYA0002A_SOD523 61.935,5.025 r90 top
D5 "PESD5V0C1BSF" PESD5V0C1BSF_SOD962-2 69.185,7.025 r0 top
D6 "TPD1E05U06DYAR" TI_DYA0002A_SOD523 49.685,65.275 r90 top
D7 "TPD1E05U06DYAR" TI_DYA0002A_SOD523 47.685,65.275 r90 top
D8 "TPD1E05U06DYAR" TI_DYA0002A_SOD523 42.185,65.275 r90 top
D9 "TPD1E05U06DYAR" TI_DYA0002A_SOD523 108.185,54.525 r0 top
D10 "TPD1E05U06DYAR" TI_DYA0002A_SOD523 42.185,21.025 r0 top
D11 "TPD1E05U06DYAR" TI_DYA0002A_SOD523 84.435,54.525 r0 top
FB1 "BLM31KN601SN1L" ?#4 42.685,23.025 r0 top
FL1 "ABSES5AF-L100KM" Abracon_ABSES5AF_1109-5 60.485,23.425 r270 top
H1 "M3_NPTH" ?#5 11.685,70.025 r0 top
H2 "M3_NPTH" ?#5 108.685,70.025 r0 top
H3 "M3_NPTH" ?#5 108.685,5.025 r0 top
H4 "M3_NPTH" ?#5 8.685,5.025 r0 top
J6 "2336582-1" TE_2336582-1_NanoSIM 24.685,66.525 r180 top
J7 "2336582-1" TE_2336582-1_NanoSIM 67.685,66.525 r180 top
J8 "U.FL-R-SMT-1(60)" Hirose_U.FL-R-SMT-1 19.685,3.525 r0 top
J9 "U.FL-R-SMT-1(60)" Hirose_U.FL-R-SMT-1 57.185,7.025 r0 top
J10 "U.FL-R-SMT-1(60)" Hirose_U.FL-R-SMT-1 77.685,3.525 r0 top
J11 "USB4105-GF-A-120" USB_C_Receptacle_GCT_USB4105-xx-A_16P_TopMnt_Horizontal 45.685,71.35 r180 top
J12 "MEM2052-00-195-00-A" GCT_MEM2052-00-195-00-A 90.685,64.9 r180 top
J13 "504050-0291" Molex_504050-0291_PicoLock-2 109.89,60.025 r90 top
J_MIC1 "504050-0691" Molex_Pico-Lock_504050-0691_1x06-1MP_P1.50mm_Horizontal 7.48,32.525 r270 top
J_MIC2 "504050-0691" Molex_Pico-Lock_504050-0691_1x06-1MP_P1.50mm_Horizontal 43.685,3.82 r0 top
J_MIC3 "504050-0691" Molex_Pico-Lock_504050-0691_1x06-1MP_P1.50mm_Horizontal 95.685,3.82 r0 top
J_MIC4 "504050-0691" Molex_Pico-Lock_504050-0691_1x06-1MP_P1.50mm_Horizontal 109.89,21.025 r90 top
J_PWR "43045-1202" Molex_43045-1202_MicroFit-12_RA 12.605,45.525 r90 top
L1 "LQH32PN2R2NN0L" ?#6 55.685,55.275 r180 top
L2 "LQW15AN27NJ00D" ?#1 63.435,4.775 r90 top
Q1 "MMBT3904,215" Nexperia_MMBT3904_SOT23 18.685,43.025 r0 top
Q2 "MMBT3904,215" Nexperia_MMBT3904_SOT23 21.685,43.025 r0 top
Q3 "MMBT3904,215" Nexperia_MMBT3904_SOT23 31.185,57.025 r0 top
Q4 "Si1016X-T1-GE3" Vishay_Si1016X_SC-89 64.685,10.025 r0 top
R1 "ERJ-2RKF1002X" ?#1 65.435,46.525 r0 top
R2 "ERJ-2RKF1003X" ?#1 65.435,43.525 r0 top
R3 "ERJ-2RKF1003X" ?#1 65.435,47.775 r0 top
R4 "ERJ-2RKF1003X" ?#1 60.435,54.275 r0 top
R5 "ERJ-2RKF1003X" ?#1 45.935,49.775 r0 top
R6 "ERJ-2RKF1003X" ?#1 52.685,55.525 r0 top
R7 "ERJ-2RKF1002X" ?#1 72.685,43.525 r0 top
R8 "ERJ-2RKF22R0X" ?#1 58.185,59.025 r0 top
R9 "ERJ-2RKF22R0X" ?#1 64.185,55.275 r90 top
R10 "ERJ-2RKF22R0X" ?#1 65.685,55.275 r90 top
R11 "ERJ-2RKF22R0X" ?#1 67.185,55.275 r90 top
R12 "ERJ-2RKF22R0X" ?#1 44.185,46.525 r0 top
R13 "ERJ-2RKF2201X" ?#1 67.185,46.525 r0 top
R14 "ERJ-2RKF2201X" ?#1 44.185,43.525 r0 top
R15 "ERJ-2RKF22R0X" ?#1 67.185,43.525 r0 top
R16 "ERJ-2RKF22R0X" ?#1 45.935,38.525 r180 top
R17 "ERJ-2RKF22R0X" ?#1 63.435,34.775 r0 top
R18 "ERJ-2RKF22R0X" ?#1 68.435,29.775 r0 top
R19 "ERJ-2RKF1003X" ?#1 12.185,32.525 r0 top
R20 "ERJ-2RKF1003X" ?#1 41.935,9.525 r0 top
R21 "ERJ-2RKF1003X" ?#1 93.185,9.775 r0 top
R22 "ERJ-2RKF1003X" ?#1 103.685,23.275 r0 top
R23 "ERJ-2RKF1003X" ?#1 57.185,27.275 r180 top
R24 "ERJ-2RKF4701X" ?#1 15.685,40.775 r0 top
R25 "ERJ-2RKF4702X" ?#1 18.185,45.525 r0 top
R26 "ERJ-2RKF4701X" ?#1 17.435,40.775 r0 top
R27 "ERJ-2RKF4702X" ?#1 19.185,40.775 r0 top
R28 "ERJ-2RKF1002X" ?#1 20.935,39.525 r0 top
R29 "ERJ-2RKF1003X" ?#1 20.935,45.525 r0 top
R30 "ERJ-2RKF1002X" ?#1 17.435,39.525 r0 top
R31 "ERJ-2RKF1002X" ?#1 15.685,39.525 r0 top
R32 "ERJ-2RKF1003X" ?#1 20.935,46.775 r0 top
R33 "ERJ-2RKF1003X" ?#1 20.935,40.775 r0 top
R34 "ERJ-2RKF1003X" ?#1 19.185,39.525 r0 top
R35 "ERJ-2RKF1003X" ?#1 41.685,17.025 r0 top
R36 "ERJ-2RKF22R0X" ?#1 13.685,29.275 r0 top
R37 "ERJ-2RKF22R0X" ?#1 43.435,19.525 r0 top
R38 "ERJ-2RKF1001X" ?#1 41.685,15.775 r0 top
R39 "ERJ-2GE0R00X" ?#1 13.685,24.275 r180 top
R40 "ERJ-2GE0R00X" ?#1 13.685,23.025 r180 top
R41 "ERJ-2RKF1001X" ?#1 43.435,18.275 r0 top
R42 "ERJ-2GE0R00X" ?#1 13.685,18.025 r0 top
R43 "ERJ-2GE0R00X" ?#1 29.435,7.025 r180 top
R44 "ERJ-2RKF4702X" ?#1 35.185,57.275 r180 top
R45 "ERJ-2RKF1003X" ?#1 40.185,62.025 r180 top
R46 "ERJ-2RKF1002X" ?#1 31.185,59.275 r0 top
R47 "ERJ-2RKF1003X" ?#1 35.185,58.525 r0 top
R48 "ERJ-2RKF1002X" ?#1 18.685,57.275 r180 top
R49 "ERJ-2RKF1002X" ?#1 61.685,57.275 r180 top
R50 "ERJ-2GE0R00X" ?#1 27.435,58.525 r0 top
R51 "ERJ-2GE0R00X" ?#1 28.685,54.275 r0 top
R52 "ERJ-2GE0R00X" ?#1 28.435,57.275 r180 top
R53 "ERJ-2GE0R00X" ?#1 70.435,58.525 r0 top
R54 "ERJ-2GE0R00X" ?#1 72.185,58.525 r0 top
R55 "ERJ-2GE0R00X" ?#1 70.435,57.275 r180 top
R56 "ERJ-2RKF22R0X" ?#1 50.935,18.275 r180 top
R57 "ERJ-2RKF22R0X" ?#1 67.435,45.025 r0 top
R58 "ERJ-2RKF22R0X" ?#1 50.935,15.775 r180 top
R59 "ERJ-2GEJ561X" ?#1 64.685,15.275 r0 top
R60 "ERJ-2GEJ104X" ?#1 52.185,10.025 r0 top
R61 "ERJ-2GEJ104X" ?#1 52.685,23.525 r90 top
R62 "ERJ-8GEYJ100V" ?#4 57.185,23.775 r0 top
R63 "ERJ-2RKF1003X" ?#1 68.935,20.025 r180 top
R64 "ERJ-2RKF1003X" ?#1 86.435,20.025 r0 top
R65 "ERJ-2RKF1003X" ?#1 68.935,21.275 r0 top
R66 "ERJ-2RKF1003X" ?#1 86.435,21.275 r0 top
R67 "ERJ-2RKF1002X" ?#1 68.935,18.775 r180 top
R68 "ERJ-2RKF1002X" ?#1 86.435,18.775 r180 top
R69 "ERJ-2RKF22R0X" ?#1 44.185,47.775 r180 top
R70 "ERJ-2RKF22R0X" ?#1 67.185,47.775 r0 top
R71 "ERJ-2RKF22R0X" ?#1 44.185,42.275 r180 top
R72 "ERJ-2RKF22R0X" ?#1 68.935,22.525 r180 top
R73 "ERJ-2GE0R00X" ?#1 70.685,5.775 r0 top
R74 "ERJ-2RKF22R0X" ?#1 105.935,33.275 r0 top
R75 "ERJ-2RKF22R0X" ?#1 67.185,42.275 r0 top
R76 "ERJ-2RKF1002X" ?#1 89.185,42.525 r0 top
R77 "ERJ-2RKF1003X" ?#1 89.185,41.275 r0 top
R78 "ERJ-2RKF1002X" ?#1 96.685,37.025 r180 top
R79 "ERJ-2RKF22R0X" ?#1 47.935,54.275 r180 top
R80 "ERJ-2RKF22R0X" ?#1 86.685,50.775 r0 top
R81 "ERJ-2RKF22R0X" ?#1 91.935,52.025 r0 top
R82 "ERJ-2RKF22R0X" ?#1 88.435,50.775 r0 top
R83 "ERJ-2RKF22R0X" ?#1 93.685,52.025 r0 top
R84 "ERJ-2RKF22R0X" ?#1 95.435,52.025 r0 top
R85 "ERJ-2RKF1002X" ?#1 97.185,52.025 r0 top
R86 "ERJ-2RKF1002X" ?#1 88.435,52.025 r0 top
R87 "ERJ-2RKF1002X" ?#1 90.185,50.775 r0 top
R88 "ERJ-2RKF1002X" ?#1 93.685,50.775 r0 top
R89 "ERJ-2RKF1002X" ?#1 90.185,52.025 r0 top
R90 "ERJ-2RKF1002X" ?#1 84.685,52.025 r0 top
R91 "ERJ-2RKF22R0X" ?#1 67.685,49.775 r0 top
R92 "ERJ-2RKF22R0X" ?#1 67.685,48.775 r0 top
R93 "ERJ-2RKF5101X" ?#1 47.685,63.525 r0 top
R94 "ERJ-2RKF5101X" ?#1 42.185,63.525 r0 top
R95 "ERJ-2RKF1001X" ?#1 50.685,60.025 r0 top
R96 "ERJ-2RKF1003X" ?#1 45.935,52.275 r0 top
R97 "ERJ-2RKF1004X" ?#1 46.685,62.275 r0 top
R98 "ERJ-2GE0R00X" ?#1 43.685,62.275 r0 top
R99 "ERJ-2RKF1002X" ?#1 105.685,58.275 r0 top
R100 "ERJ-2RKF1001X" ?#1 99.685,47.025 r180 top
R101 "ERJ-2RKF22R0X" ?#1 42.185,44.025 r0 top
R102 "ERJ-2RKF1001X" ?#1 42.185,42.025 r180 top
R103 "ERJ-2GE0R00X" ?#1 30.685,52.525 r0 top
TP_BLE_SWD "TEST_PADS" ?#7 87.685,52.025 r180 bottom
TP_CELL_DBG "TEST_PADS" ?#8 50.685,45.025 r180 bottom
TP_CELL_USB "TEST_PADS" ?#7 36.685,45.025 r180 bottom
TP_EOL "TEST_PADS" ?#9 36.685,52.025 r180 bottom
TP_MCU_SWD "TEST_PADS" ?#8 72.685,52.025 r180 bottom
U1 "STM32U585VIT6Q" ST_STM32U585_LQFP100_1L 55.685,45.025 r0 top
U2 "W25Q512JVFIQ" Winbond_W25Q512JV_PackageF_IPC_Candidate 79.685,43.525 r0 top
U3 "LIS2DW12TR" ST_LIS2DW12_LGA-12L 69.685,44.525 r0 top
U4 "STTS22HTR" STTS22H_UDFN-6L 69.685,38.525 r0 top
U5 "LT6000IDCB#TRMPBF" LT6000_DCB-7 64.685,18.025 r0 top
U6 "SN74LVC1G07DBVR" TI_DBV0005A_SOT23-5 94.185,39.525 r0 top
U7 "SN74AXC8T245PWR" TI_PW0024A_TSSOP24 63.435,29.775 r0 top
U8 "BG95-M3" Quectel_BG95-M3_LGA-102 27.685,23.025 r0 top
U9 "MAX-M10S-00B" u-blox_MAX-M10S_LCC-18 57.185,17.025 r0 top
U10 "E22-900M22S" Ebyte_E22-M22S_Castellated-22 77.685,20.025 r0 top
U11 "MDBT50Q-P1MV2" Raytac_MDBT50Q-P1MV2 105.935,39.775 r270 top
U13 "TS3A27518EPWR" TI_PW0024A_TSSOP24 40.185,57.025 r0 top
U14 "ESDALC6V1-5P6" ST_ESDALC6V1-5P6_SOT666 25.685,55.525 r0 top
U15 "ESDALC6V1-5P6" ST_ESDALC6V1-5P6_SOT666 77.185,63.025 r0 top
U16 "SN74AXC8T245PWR" TI_PW0024A_TSSOP24 27.685,42.275 r0 top
U17 "SN74LVC32APWR" TI_PW0014A_TSSOP14 50.685,29.025 r0 top
U18 "SN74AXC1T45DRLR" TI_DRL0006A_SOT6 57.185,29.025 r0 top
U19 "TPD4E05U06DQAR" TI_DQA0010A_USON10 12.435,36.525 r0 top
U20 "TPD4E05U06DQAR" TI_DQA0010A_USON10 41.935,13.025 r0 top
U21 "TPD4E05U06DQAR" TI_DQA0010A_USON10 95.685,9.775 r0 top
U22 "TPD4E05U06DQAR" TI_DQA0010A_USON10 104.435,21.025 r0 top
U23 "TPD4E05U06DQAR" TI_DQA0010A_USON10 86.685,54.025 r0 top
U24 "TPD4E05U06DQAR" TI_DQA0010A_USON10 91.685,54.025 r0 top
U25 "TPD2EUSB30DRTR" TI_DRT0003A_IPC_Candidate 45.685,65.775 r180 top
U26 "TPD2EUSB30DRTR" TI_DRT0003A_IPC_Candidate 12.185,23.525 r270 top
U27 "TPD4E05U06DQAR" TI_DQA0010A_USON10 44.685,10.025 r0 top
X1 "SiT1552AI-JE-DCC-32.768D" SiT1552_JE_CSP-4 65.435,45.025 r0 top

## Footprints (in the part's own frame and the unit in brackets; to place one, negate y for a bottom-side part, rotate by r counter-clockwise, add the part's x,y. Pads: shape width x height; smd on the part's side, far side on the other; paste and mask are expansions set on the pad)
Abracon_ABSES5AF_1109-5 [mm]
  rect 0.25x0.3 smd mask+0: A(0.375,-0.25) B(0,-0.25) C(-0.375,0) D(0,0.25) E(0.375,0.25)
Ebyte_E22-M22S_Castellated-22 [mm]
  rect 0.9x0.8 smd mask+0: 1(7.45,-9) 2(7.45,-7.73) 3(7.45,-6.46) 4(7.45,-0.89) 5(7.45,0.38) 6(7.45,1.65) 7(7.45,2.92) 8(7.45,4.19) 9(7.45,5.46) 10(7.45,6.73) 11(7.45,8) 12(-7.45,8) 13(-7.45,6.73) 14(-7.45,5.46) 15(-7.45,4.19) 16(-7.45,2.92) 17(-7.45,1.65) 18(-7.45,0.38) 19(-7.45,-0.89) 20(-7.45,-6.46) 21(-7.45,-7.73) 22(-7.45,-9)
  silkscreen extent 7.15,-9.45 7.15,-8.55
GCT_MEM2052-00-195-00-A [mm]
  rect 0.8x1.5 smd mask+0: 1(1.905,-3.635)
  rrect20% 0.8x1.5 smd mask+0: 2(0.805,-3.235) 3(-0.295,-3.635) 4(-1.395,-3.835) 5(-2.495,-3.635) 6(-3.595,-3.835) 7(-4.695,-3.635) 8(-5.795,-3.635)
  rect 1x1.04 smd mask+0: CD(-3.585,7.595)
  rect 1.4x1.9 smd mask+0: SHIELD(-6.575,-5.925) SHIELD(6.575,-6.925)
  rect 1.2x1.4 smd mask+0: SHIELD(-5.035,7.225)
  rect 1.3x1.4 smd mask+0: SHIELD(0.715,7.225)
Hirose_U.FL-R-SMT-1 [mm]
  rect 1.05x1 smd paste-1.05 mask+0: 1(-1.05,0)
  rect 2.2x1.05 smd paste-2.2 mask+0: SHIELD(0.475,-1.475) SHIELD(0.475,1.475)
  rect 0.85x0.8 on Top Paste mask-0.85: Un1(-1.05,0)
  rect 2x0.9 on Top Paste mask-2: Un2(0.475,1.475) Un3(0.475,-1.475)
KEMET_T52X_D_7343-31_DensityB [mm]
  rect 2.37x2.43 smd mask+0: 1(-3.12,0) 2(3.12,0)
  silkscreen extent -4.42,-1.35 -3.92,1.35
LT6000_DCB-7 [mm]
  rect 0.25x0.7 smd mask+0: 1(0.5,-1.425)
  rrect20% 0.25x0.7 smd mask+0: 2(0,-1.425) 3(-0.5,-1.425) 4(-0.5,1.425) 5(0,1.425) 6(0.5,1.425)
  rect 1.35x1.65 smd mask+0: EP(0,0)
  silkscreen extent 0.65,-1.62 1.05,-1.62
Molex_43045-1202_MicroFit-12_RA [mm]
  rrect20% 1.5x1.5 hole 1.02 paste-2539.97 mask+0: 1(0,0)
  round 1.5 hole 1.02 paste-2539.97 mask+0: 2(3,0) 3(6,0) 4(9,0) 5(12,0) 6(15,0) 7(0,-3) 8(3,-3) 9(6,-3) 10(9,-3) 11(12,-3) 12(15,-3)
  round 3 hole 3 paste-2539.97 mask+0: Un1(2.15,4.32) Un2(12.85,4.32)
Molex_504050-0291_PicoLock-2 [mm]
  rect 0.6x1 smd mask+0: 1(-0.75,2.795)
  rrect20% 0.6x1 smd mask+0: 2(0.75,2.795)
  rect 1.25x1.8 smd mask+0: Un1(-3.355,-2.395) Un2(3.355,-2.395)
Molex_Pico-Lock_504050-0691_1x06-1MP_P1.50mm_Horizontal [mm]
  rrect25% 0.6x1 smd mask+0: 1(-3.75,2.795) 2(-2.25,2.795) 3(-0.75,2.795) 4(0.75,2.795) 5(2.25,2.795) 6(3.75,2.795)
  rrect20% 1.25x1.8 smd mask+0: Un1(-6.355,-2.395) Un2(6.355,-2.395)
  silkscreen extent -6.49,-3.42 6.49,3.29
Nexperia_MMBT3904_SOT23 [mm]
  rect 0.7x0.6 smd paste-0.7 mask+0.075: 1(-1,0.95) 2(-1,-0.95) 3(1,0)
  rect 0.6x0.5 on Top Paste mask-0.6: Un1(-1,0.95) Un2(-1,-0.95) Un3(1,0)
  silkscreen extent -1.35,1.43 -0.95,1.63
Nexperia_PESD5V0S1UL_SOD882 [mm]
  rrect25% 0.4x0.7 smd paste-0.7 mask+0.05: 1(-0.35,0) 2(0.35,0)
  rrect33% 0.3x0.6 on Top Paste mask-0.6: Un1(-0.35,0) Un2(0.35,0)
  silkscreen extent -0.72,0.32 -0.44,0.46
PESD5V0C1BSF_SOD962-2 [mm]
  rect 0.256x0.2 smd mask+0: 1(-0.2,0)
  rrect25% 0.256x0.2 smd mask+0: 2(0.2,0)
  silkscreen extent -0.48,-0.32 -0.48,0.32
Quectel_BG95-M3_LGA-102 [mm]
  rect 1.1x0.7 smd mask+0: 1(-9.15,9.7)
  rrect20% 1.1x0.7 smd mask+0: 2(-9.15,8.6) 3(-9.15,7.5) 4(-9.15,6.4) 5(-9.15,5.3) 6(-9.15,4.2) 7(-9.15,3.1) 8(-9.15,2) 9(-9.15,0.9) 10(-9.15,-0.2) 11(-9.15,-1.9) 12(-9.15,-3) 13(-9.15,-4.1) 14(-9.15,-5.2) 15(-9.15,-6.3) 16(-9.15,-7.4) 17(-9.15,-8.5) 18(-9.15,-9.6) 32(9.15,-9.6) 33(9.15,-8.5) 34(9.15,-7.4) 35(9.15,-6.3) 36(9.15,-5.2) 37(9.15,-4.1) 38(9.15,-3) 39(9.15,-1.9) 40(9.15,-0.2) 41(9.15,0.9) 42(9.15,2) 43(9.15,3.1) 44(9.15,4.2) 45(9.15,5.3) 46(9.15,6.4) 47(9.15,7.5) 48(9.15,8.6) 49(9.15,9.7)
  rrect20% 0.7x1.1 smd mask+0: 19(-7.45,-11) 20(-6.35,-11) 21(-5.25,-11) 22(-4.15,-11) 23(-3.05,-11) 24(-1.95,-11) 25(0.55,-11) 26(1.65,-11) 27(2.75,-11) 28(3.85,-11) 29(4.95,-11) 30(6.05,-11) 31(7.15,-11) 50(7.15,11) 51(6.05,11) 52(4.95,11) 53(3.85,11) 54(2.75,11) 55(1.65,11) 56(0.55,11) 57(-1.95,11) 58(-3.05,11) 59(-4.15,11) 60(-5.25,11) 61(-6.35,11) 62(-7.45,11)
  rrect20% 1x1 smd mask+0: 63(-5.95,4.25) 64(-5.95,2.55) 65(-5.95,0.85) 66(-5.95,-0.85) 67(-5.95,-2.55) 68(-5.95,-4.25) 69(-2.55,-7.65) 70(-0.85,-7.65) 71(0.85,-7.65) 72(2.55,-7.65) 73(5.95,-4.25) 74(5.95,-2.55) 75(5.95,-0.85) 76(5.95,0.85) 77(5.95,2.55) 78(5.95,4.25) 79(2.55,7.65) 80(0.85,7.65) 81(-0.85,7.65) 82(-2.55,7.65) 83(-4.25,4.25) 84(-4.25,2.55) 85(-4.25,0.85) 86(-4.25,-0.85) 87(-4.25,-2.55) 88(-4.25,-4.25) 89(-2.55,-5.95) 90(-0.85,-5.95) 91(0.85,-5.95) 92(2.55,-5.95) 93(4.25,-4.25) 94(4.25,-2.55) 95(4.25,-0.85) 96(4.25,0.85) 97(4.25,2.55) 98(4.25,4.25) 99(2.55,5.95) 100(0.85,5.95) 101(-0.85,5.95) 102(-2.55,5.95)
  silkscreen extent -10.1,-11.95 10.1,11.95
Raytac_MDBT50Q-P1MV2 [mm]
  rect 0.6x0.4 smd mask+0: 1(-4.65,3.75) 2(-4.65,2.65) 3(-4.65,1.85) 4(-4.65,0.25) 5(-3.75,-0.15) 6(-4.65,-0.55) 7(-3.75,-0.95) 8(-4.65,-1.35) 9(-3.75,-1.75) 10(-4.65,-2.15) 11(-3.75,-2.55) 12(-4.65,-2.95) 13(-3.75,-3.35) 14(-4.65,-3.75) 34(4.65,-6.15) 35(4.65,-5.35) 36(3.75,-4.95) 37(4.65,-4.55) 38(3.75,-4.15) 39(4.65,-3.75) 40(3.75,-3.35) 41(4.65,-2.95) 42(3.75,-2.55) 43(3.75,-1.75) 44(4.65,-1.35) 45(3.75,-0.95) 46(4.65,-0.55) 47(3.75,-0.15) 48(4.65,0.25) 49(3.75,0.65) 50(3.75,1.45) 51(4.65,1.85) 52(3.75,2.25) 53(4.65,2.65) 54(3.75,3.05) 55(4.65,3.75)
  rect 0.4x0.6 smd mask+0: 15(-4.8,-7.15) 16(-4,-7.15) 17(-3.2,-7.15) 18(-2.4,-7.15) 19(-2,-6.25) 20(-1.6,-7.15) 21(-1.2,-6.25) 22(-0.8,-7.15) 23(-0.4,-6.25) 24(0,-7.15) 25(0.4,-6.25) 26(0.8,-7.15) 27(1.2,-6.25) 28(1.6,-7.15) 29(2,-6.25) 30(2.4,-7.15) 31(3.2,-7.15) 32(4,-7.15) 33(4.8,-7.15) 56(-2,-0.55) 57(-1.2,-0.55) 58(-0.4,-0.55) 59(0.4,-0.55) 60(1.2,-0.55) 61(2,-0.55)
SiT1552_JE_CSP-4 [mm]
  round 0.25 smd mask+0.05: 1(-0.5,-0.205) 2(0.5,-0.205) 3(0.5,0.205) 4(-0.5,0.205)
  silkscreen extent -0.77,-0.54 -0.37,-0.54
ST_ESDALC6V1-5P6_SOT666 [mm]
  rect 0.99x0.3 smd mask+0: 1(-0.805,0.5) 2(-0.805,0) 3(-0.805,-0.5) 4(0.805,-0.5) 5(0.805,0) 6(0.805,0.5)
  silkscreen extent -1.48,0.57 -1.08,0.77
ST_LIS2DW12_LGA-12L [mm]
  rect 0.375x0.35 smd mask+0.05: 1(-0.763,0.75) 2(-0.763,0.25) 3(-0.763,-0.25) 4(-0.763,-0.75) 7(0.763,-0.75) 8(0.763,-0.25) 9(0.763,0.25) 10(0.763,0.75)
  rect 0.35x0.375 smd mask+0.05: 5(-0.25,-0.763) 6(0.25,-0.763) 11(0.25,0.763) 12(-0.25,0.763)
ST_STM32U585_LQFP100_1L [mm]
  rect 1.2x0.3 smd mask+0: 1(-7.75,6) 2(-7.75,5.5) 3(-7.75,5) 4(-7.75,4.5) 5(-7.75,4) 6(-7.75,3.5) 7(-7.75,3) 8(-7.75,2.5) 9(-7.75,2) 10(-7.75,1.5) 11(-7.75,1) 12(-7.75,0.5) 13(-7.75,0) 14(-7.75,-0.5) 15(-7.75,-1) 16(-7.75,-1.5) 17(-7.75,-2) 18(-7.75,-2.5) 19(-7.75,-3) 20(-7.75,-3.5) 21(-7.75,-4) 22(-7.75,-4.5) 23(-7.75,-5) 24(-7.75,-5.5) 25(-7.75,-6) 51(7.75,-6) 52(7.75,-5.5) 53(7.75,-5) 54(7.75,-4.5) 55(7.75,-4) 56(7.75,-3.5) 57(7.75,-3) 58(7.75,-2.5) 59(7.75,-2) 60(7.75,-1.5) 61(7.75,-1) 62(7.75,-0.5) 63(7.75,0) 64(7.75,0.5) 65(7.75,1) 66(7.75,1.5) 67(7.75,2) 68(7.75,2.5) 69(7.75,3) 70(7.75,3.5) 71(7.75,4) 72(7.75,4.5) 73(7.75,5) 74(7.75,5.5) 75(7.75,6)
  rect 0.3x1.2 smd mask+0: 26(-6,-7.75) 27(-5.5,-7.75) 28(-5,-7.75) 29(-4.5,-7.75) 30(-4,-7.75) 31(-3.5,-7.75) 32(-3,-7.75) 33(-2.5,-7.75) 34(-2,-7.75) 35(-1.5,-7.75) 36(-1,-7.75) 37(-0.5,-7.75) 38(0,-7.75) 39(0.5,-7.75) 40(1,-7.75) 41(1.5,-7.75) 42(2,-7.75) 43(2.5,-7.75) 44(3,-7.75) 45(3.5,-7.75) 46(4,-7.75) 47(4.5,-7.75) 48(5,-7.75) 49(5.5,-7.75) 50(6,-7.75) 76(6,7.75) 77(5.5,7.75) 78(5,7.75) 79(4.5,7.75) 80(4,7.75) 81(3.5,7.75) 82(3,7.75) 83(2.5,7.75) 84(2,7.75) 85(1.5,7.75) 86(1,7.75) 87(0.5,7.75) 88(0,7.75) 89(-0.5,7.75) 90(-1,7.75) 91(-1.5,7.75) 92(-2,7.75) 93(-2.5,7.75) 94(-3,7.75) 95(-3.5,7.75) 96(-4,7.75) 97(-4.5,7.75) 98(-5,7.75) 99(-5.5,7.75) 100(-6,7.75)
  silkscreen extent -8.08,6.41 -7.4,6.88
STTS22H_UDFN-6L [mm]
  rect 0.27x0.7 smd mask+0: 1(-0.65,-0.865)
  rrect20% 0.27x0.7 smd mask+0: 2(0,-0.865) 3(0.65,-0.865) 4(0.65,0.865) 5(0,0.865) 6(-0.65,0.865)
  rect 1.45x0.65 smd mask+0: EP(0,0)
  silkscreen extent -0.98,-0.98 -0.82,-0.82
TE_2336582-1_NanoSIM [mm]
  rect 0.8x1.14 smd mask+0: 1(1.905,5.43) 2(-0.635,5.43) 3(-3.175,5.43) 4(3.175,5.43) 5(0.635,5.43) 6(-1.905,5.43)
  rect 0.95x2.05 smd mask+0: 7(4.125,4.405)
  rect 1.5x2.1 smd mask+0: SHIELD(-6.5,-3.95) SHIELD(6.5,-3.95)
  round 1.2 hole 1.2 paste-2539.97 mask+0: Un1(-2.54,2.5) Un2(-2.54,-3.94) Un3(0,2.5) Un4(0,-3.94) Un5(2.54,2.5) Un6(2.54,-3.94)
TI_DBV0005A_SOT23-5 [mm]
  rrect17% 1.1x0.6 smd mask+0.07: 1(-1.3,0.95) 2(-1.3,0) 3(-1.3,-0.95) 4(1.3,-0.95) 5(1.3,0.95)
  silkscreen extent -1.68,1.08 -1.28,1.28
TI_DQA0010A_USON10 [mm]
  rrect50% 0.565x0.2 smd mask+0.07: 1(-0.417,1) 2(-0.417,0.5) 4(-0.417,-0.5) 5(-0.417,-1) 6(0.417,-1) 7(0.417,-0.5) 9(0.417,0.5) 10(0.417,1)
  rrect25% 0.565x0.4 smd paste-0.565 mask+0.07: 3(-0.417,0) 8(0.417,0)
  rrect28% 0.565x0.36 on Top Paste mask-0.565: Un1(-0.417,0) Un2(0.417,0)
  silkscreen extent -0.88,1.1 -0.48,1.35
TI_DRL0006A_SOT6 [mm]
  rrect33% 0.67x0.3 smd mask+0.05: 1(-0.74,0.5) 2(-0.74,0) 3(-0.74,-0.5) 4(0.74,-0.5) 5(0.74,0) 6(0.74,0.5)
  silkscreen extent -1.2,0.67 -0.8,0.92
TI_DRT0003A_IPC_Candidate [mm]
  rrect25% 0.3x0.3 smd mask+0: 1(-0.35,-0.425) 2(0.35,-0.425) 3(0,0.425)
  silkscreen extent -1.04,-0.71 -0.76,-0.43
TI_DYA0002A_SOD523 [mm]
  rrect25% 0.67x0.4 smd mask+0.05: 1(-0.74,0) 2(0.74,0)
  silkscreen extent -1.18,0.46 -0.82,0.64
TI_PW0014A_TSSOP14 [mm]
  rrect11% 1.5x0.45 smd mask+0.05: 1(-2.9,1.95) 2(-2.9,1.3) 3(-2.9,0.65) 4(-2.9,0) 5(-2.9,-0.65) 6(-2.9,-1.3) 7(-2.9,-1.95) 8(2.9,-1.95) 9(2.9,-1.3) 10(2.9,-0.65) 11(2.9,0) 12(2.9,0.65) 13(2.9,1.3) 14(2.9,1.95)
  silkscreen extent -3.16,2.1 -2.52,2.55
TI_PW0024A_TSSOP24 [mm]
  rrect11% 1.5x0.45 smd mask+0.05: 1(-2.9,3.575) 2(-2.9,2.925) 3(-2.9,2.275) 4(-2.9,1.625) 5(-2.9,0.975) 6(-2.9,0.325) 7(-2.9,-0.325) 8(-2.9,-0.975) 9(-2.9,-1.625) 10(-2.9,-2.275) 11(-2.9,-2.925) 12(-2.9,-3.575) 13(2.9,-3.575) 14(2.9,-2.925) 15(2.9,-2.275) 16(2.9,-1.625) 17(2.9,-0.975) 18(2.9,-0.325) 19(2.9,0.325) 20(2.9,0.975) 21(2.9,1.625) 22(2.9,2.275) 23(2.9,2.925) 24(2.9,3.575)
  silkscreen extent -3.16,3.73 -2.52,4.08
u-blox_MAX-M10S_LCC-18 [mm]
  rect 0.7x1.8 smd paste-1.8 mask+0: 1(-4.4,-4.75) 9(4.4,-4.75) 10(4.4,4.75) 18(-4.4,4.75)
  rect 0.8x1.8 smd paste-1.8 mask+0: 2(-3.3,-4.75) 3(-2.2,-4.75) 4(-1.1,-4.75) 5(0,-4.75) 6(1.1,-4.75) 7(2.2,-4.75) 8(3.3,-4.75) 11(3.3,4.75) 12(2.2,4.75) 13(1.1,4.75) 14(0,4.75) 15(-1.1,4.75) 16(-2.2,4.75) 17(-3.3,4.75)
  silkscreen extent -5.05,-5 -4.55,-5
USB_C_Receptacle_GCT_USB4105-xx-A_16P_TopMnt_Horizontal [mm]
  rrect25% 0.6x1.15 smd mask+0: A1(-3.2,3.68) A4(-2.4,3.68) A9(2.4,3.68) A12(3.2,3.68) B1(3.2,3.68) B4(2.4,3.68) B9(-2.4,3.68) B12(-3.2,3.68)
  rrect25% 0.3x1.15 smd mask+0: A5(-1.25,3.68) A6(-0.25,3.68) A7(0.25,3.68) A8(1.25,3.68) B5(1.75,3.68) B6(0.75,3.68) B7(-0.75,3.68) B8(-1.75,3.68)
  rrect100% 1x2.1 hole 1.7 slot 0.6 at 0 deg mask+0: SHIELD(-4.32,3.105) SHIELD(4.32,3.105)
  rrect100% 1x1.8 hole 1.4 slot 0.6 at 0 deg mask+0: SHIELD(-4.32,-1.075) SHIELD(4.32,-1.075)
  round 0.65 hole 0.65 paste-2539.97 mask+0: Un1(-2.89,2.605) Un2(2.89,2.605)
  silkscreen extent -4.67,0.1 4.67,1.8
Vishay_Si1016X_SC-89 [mm]
  rect 0.478x0.3 smd mask+0: 1(-0.638,0.5) 2(-0.638,0) 3(-0.638,-0.5) 4(0.638,-0.5) 5(0.638,0) 6(0.638,0.5)
  silkscreen extent -1.08,0.57 -0.68,0.77
Winbond_W25Q512JV_PackageF_IPC_Candidate [mm]
  rrect25% 2.05x0.6 smd mask+0: 1(-4.65,4.445) 2(-4.65,3.175) 3(-4.65,1.905) 4(-4.65,0.635) 5(-4.65,-0.635) 6(-4.65,-1.905) 7(-4.65,-3.175) 8(-4.65,-4.445) 9(4.65,-4.445) 10(4.65,-3.175) 11(4.65,-1.905) 12(4.65,-0.635) 13(4.65,0.635) 14(4.65,1.905) 15(4.65,3.175) 16(4.65,4.445)
  silkscreen extent -5.05,5 -4.37,5.48
?#1 [mm]
  rrect20% 0.45x0.5 smd mask+0: 1(-0.325,0) 2(0.325,0)
?#2 [mm]
  rrect20% 0.7x0.8 smd mask+0: 1(-0.45,0) 2(0.45,0)
?#3 [mm]
  rrect20% 1x1.2 smd mask+0: 1(-0.6,0) 2(0.6,0)
?#4 [mm]
  rrect20% 1.4x1.6 smd mask+0: 1(-0.9,0) 2(0.9,0)
?#5 [mm]
  round 3.2 hole 3.2 paste-2539.97 mask-3.2: Un1(0,0)
?#6 [mm]
  rrect20% 1.4x2.4 smd mask+0: 1(-0.9,0) 2(0.9,0)
?#7 [mm]
  round 1.7 smd paste-1.7 mask+0.2: 1(0,0) 2(-2.54,0) 3(-5.08,0) 4(-7.62,0)
?#8 [mm]
  round 1.7 smd paste-1.7 mask+0.2: 1(0,0) 2(-2.54,0) 3(-5.08,0) 4(-7.62,0) 5(-10.16,0)
?#9 [mm]
  round 1.7 smd paste-1.7 mask+0.2: 1(0,0) 2(-2.54,0) 3(-5.08,0) 4(-7.62,0) 5(-10.16,0) 6(-12.7,0) 7(-15.24,0) 8(-17.78,0) 9(-20.32,0) 10(-22.86,0) 11(-25.4,0) 12(-27.94,0) 13(-30.48,0)

## Part data
C1 C2 C3 C4 C5 C7 C8 C9 C10 C11 C12 C14 C15 C16 C17 C18 C21 C22 C23 C25 C26 C27 C28 C29 C30 C31 C32 C33 C34 C35 C37 C38 C39 C40 C41 C42 C43 C45 C46 C47 C48 C49 C50 C51 C52 C53 C54 C55 C56 C57 C58 C59 C60 C62 C63 C64 C65 C66 C68 C69 C70 C71 C73 C74 C76 C77 C78 C79 C80 L2 R1 R2 R3 R4 R5 R6 R7 R8 R9 R10 R11 R12 R13 R14 R15 R16 R17 R18 R19 R20 R21 R22 R23 R24 R25 R26 R27 R28 R29 R30 R31 R32 R33 R34 R35 R36 R37 R38 R39 R40 R41 R42 R43 R44 R45 R46 R47 R48 R49 R50 R51 R52 R53 R54 R55 R56 R57 R58 R59 R60 R61 R63 R64 R65 R66 R67 R68 R69 R70 R71 R72 R73 R74 R75 R76 R77 R78 R79 R80 R81 R82 R83 R84 R85 R86 R87 R88 R89 R90 R91 R92 R93 R94 R95 R96 R97 R98 R99 R100 R101 R102 R103: DIONEA_PACKAGE=0402, DIONEA_COURTYARD_SOURCE=PCB_MAIN_PASSIVE_COURTYARD_RULE_REV_A, DIONEA_COURTYARD_STATUS=CONTROLLED_PAD_ENVELOPE_PLUS_0.25_MM, DIONEA_PLACEMENT_CLASS=UNLOCKED_LAYOUT_CANDIDATE, DIONEA_PLACEMENT_SOURCE=PCB_MAIN_PLACEMENT_REPACK_REV_A
  C1 C2 C3 C4 C5 C7 C8 C9 C10 C11 C12 C14 C15 C18 C21 C22 C23 C25 C26 C27 C28 C29 C30 C31 C32 C33 C34 C35 C37 C38 C39 C40 C41 C42 C43 C45 C46 C47 C48 C49 C50 C51 C52 C53 C60 C62 C63 C64 C65 C66 C68 C71 C73 C74 C76 C77 C78 L2 R1 R2 R3 R5 R7 R8 R9 R10 R11 R12 R13 R14 R15 R16 R17 R18 R19 R20 R21 R22 R23 R24 R25 R26 R27 R28 R29 R30 R31 R32 R33 R34 R35 R36 R37 R38 R39 R40 R41 R42 R43 R44 R45 R46 R47 R48 R49 R50 R51 R52 R53 R54 R55 R56 R57 R58 R59 R60 R61 R63 R64 R65 R66 R67 R68 R69 R70 R71 R72 R73 R74 R75 R76 R77 R78 R79 R80 R81 R82 R83 R84 R85 R86 R87 R88 R89 R90 R91 R92 R93 R94 R95 R96 R97 R99 R100 R101 R102 R103: DIONEA_POPULATION=FITTED
  C16 C17 C54 C55 C56 C57 C58 C59 C69 C70 C79 C80 R4 R6 R98: DIONEA_POPULATION=DNP
C6 C13 C20 C24 C61 C67 C72 C75: DIONEA_PACKAGE=0603, DIONEA_COURTYARD_SOURCE=PCB_MAIN_PASSIVE_COURTYARD_RULE_REV_A, DIONEA_COURTYARD_STATUS=CONTROLLED_PAD_ENVELOPE_PLUS_0.25_MM, DIONEA_PLACEMENT_CLASS=UNLOCKED_LAYOUT_CANDIDATE, DIONEA_PLACEMENT_SOURCE=PCB_MAIN_PLACEMENT_REPACK_REV_A, DIONEA_POPULATION=FITTED
C19: DIONEA_PACKAGE=0805, DIONEA_COURTYARD_SOURCE=PCB_MAIN_PASSIVE_COURTYARD_RULE_REV_A, DIONEA_COURTYARD_STATUS=CONTROLLED_PAD_ENVELOPE_PLUS_0.25_MM, DIONEA_PLACEMENT_CLASS=UNLOCKED_LAYOUT_CANDIDATE, DIONEA_PLACEMENT_SOURCE=PCB_MAIN_PLACEMENT_REPACK_REV_A, DIONEA_POPULATION=FITTED
C36 C44: library part KEMET_T52X_D_7343-31_DensityB, "KEMET T52X/T530 D case 7343-31; T2076 Table 2 Density Level B land and courtyard", DIONEA_PACKAGE=7343-31, DIONEA_FOOTPRINT_SOURCE=KEMET_T2076_T52X-530_2026-08-20_Table2_DensityB, DIONEA_FOOTPRINT_STATUS=MANUFACTURER_DRAWING_PATTERN_CONTROLLED, DIONEA_PLACEMENT_CLASS=UNLOCKED_LAYOUT_CANDIDATE, DIONEA_PLACEMENT_SOURCE=PCB_MAIN_PLACEMENT_REPACK_REV_A, DIONEA_POPULATION=FITTED
D1 D2: library part Nexperia_PESD5V0S1UL_SOD882, "Nexperia PESD5V0S1UL SOD882; data sheet v5 2025-12-01 Figure 11 reflow footprint", DIONEA_PACKAGE=SOD882, DIONEA_FOOTPRINT_SOURCE=Nexperia_PESD5V0S1UL_v5_2025-12-01_Fig11_ReflowFootprint, DIONEA_FOOTPRINT_STATUS=MANUFACTURER_DRAWING_PATTERN_CONTROLLED, DIONEA_PLACEMENT_CLASS=UNLOCKED_LAYOUT_CANDIDATE, DIONEA_PLACEMENT_SOURCE=PCB_MAIN_PLACEMENT_REPACK_REV_A, DIONEA_POPULATION=FITTED
D3 D5: library part PESD5V0C1BSF_SOD962-2, "Nexperia PESD5V0C1BSF, DSN0603-2 / SOD962-2; manufacturer reflow footprint, datasheet v3 2022-01-21", DIONEA_PACKAGE=SOD962-2, DIONEA_FOOTPRINT_SOURCE=Nexperia_PESD5V0C1BSF_v3_Fig14, DIONEA_FOOTPRINT_STATUS=MANUFACTURER_DRAWING_PATTERN_CONTROLLED, DIONEA_PLACEMENT_CLASS=UNLOCKED_LAYOUT_CANDIDATE, DIONEA_PLACEMENT_SOURCE=PCB_MAIN_PLACEMENT_REPACK_REV_A, DIONEA_POPULATION=FITTED
D4 D6 D7 D8 D9 D10 D11: library part TI_DYA0002A_SOD523, "TI DYA0002A 2-pin SOD-523; 4224978/B 09/2021 example board layout", DIONEA_PACKAGE=SOD-523_DYA, DIONEA_FOOTPRINT_SOURCE=TI_DYA0002A_4224978B_2021-09_RecommendedLandPattern, DIONEA_FOOTPRINT_STATUS=MANUFACTURER_DRAWING_PATTERN_CONTROLLED, DIONEA_PLACEMENT_CLASS=UNLOCKED_LAYOUT_CANDIDATE, DIONEA_PLACEMENT_SOURCE=PCB_MAIN_PLACEMENT_REPACK_REV_A, DIONEA_POPULATION=FITTED
FB1 R62: DIONEA_PACKAGE=1206, DIONEA_COURTYARD_SOURCE=PCB_MAIN_PASSIVE_COURTYARD_RULE_REV_A, DIONEA_COURTYARD_STATUS=CONTROLLED_PAD_ENVELOPE_PLUS_0.25_MM, DIONEA_PLACEMENT_CLASS=UNLOCKED_LAYOUT_CANDIDATE, DIONEA_PLACEMENT_SOURCE=PCB_MAIN_PLACEMENT_REPACK_REV_A, DIONEA_POPULATION=FITTED
FL1: library part Abracon_ABSES5AF_1109-5, "Abracon ABSES5AF-L100KM 1.1x0.9 mm 5-pad SAW; datasheet 2025-09-16 recommended land pattern", DIONEA_PACKAGE=1109-5, DIONEA_FOOTPRINT_SOURCE=Abracon_ABSES5AF-L100KM_2025-09-16_LandPattern, DIONEA_FOOTPRINT_STATUS=MANUFACTURER_DRAWING_PATTERN_CONTROLLED, DIONEA_PLACEMENT_CLASS=UNLOCKED_LAYOUT_CANDIDATE, DIONEA_PLACEMENT_SOURCE=PCB_MAIN_PLACEMENT_REPACK_REV_A, DIONEA_POPULATION=FITTED
J6 J7: library part TE_2336582-1_NanoSIM, "TE Connectivity 2336582-1 Nano-SIM push-push H1.37; customer drawing C-2336582 Rev A2", DIONEA_PACKAGE=TE_NanoSIM_H1.37, DIONEA_FOOTPRINT_SOURCE=TE_C-2336582_RevA2_RecommendedPCBLayout, DIONEA_FOOTPRINT_STATUS=MANUFACTURER_DRAWING_PATTERN_CONTROLLED, DIONEA_PLACEMENT_DATUM=MATING_FACE_TO_MANUFACTURER_FOOTPRINT_ORIGIN, DIONEA_POPULATION=FITTED
  J6: DIONEA_MECHANICAL_ANCHOR=21.000,2.500,180.000
  J7: DIONEA_MECHANICAL_ANCHOR=64.000,2.500,180.000
J8 J9 J10: library part Hirose_U.FL-R-SMT-1, "Hirose U.FL-R-SMT-1 vertical receptacle; U.FL catalog 2026-08-01 recommended PCB and metal-mask patterns", DIONEA_PACKAGE=U.FL_SMT, DIONEA_FOOTPRINT_SOURCE=Hirose_U.FL_CAT_2026-08-01_PCB_and_MetalMask, DIONEA_FOOTPRINT_STATUS=MANUFACTURER_DRAWING_PATTERN_CONTROLLED, DIONEA_PLACEMENT_DATUM=MANUFACTURER_FOOTPRINT_ORIGIN, DIONEA_POPULATION=FITTED
  J8: DIONEA_MECHANICAL_ANCHOR=16.000,71.500,0.000
  J9: DIONEA_MECHANICAL_ANCHOR=53.500,68.000,0.000
  J10: DIONEA_MECHANICAL_ANCHOR=74.000,71.500,0.000
J11: library part USB_C_Receptacle_GCT_USB4105-xx-A_16P_TopMnt_Horizontal, "USB 2.0 Type C Receptacle, GCT, 16P, top mounted, horizontal, 5A: https://gct.co/files/drawings/usb4105.pdf", DIONEA_PACKAGE=USB-C_16P_horizontal_top_mount_1.20mm_stake, DIONEA_FOOTPRINT_SOURCE=GCT_USB4105_RevB4_2023-12-18_RecommendedPCBLayout, DIONEA_FOOTPRINT_STATUS=KICAD_LIBRARY_PATTERN_DRAWING_VERIFIED, DIONEA_MECHANICAL_ANCHOR=42.000,0.000,180.000, DIONEA_PLACEMENT_DATUM=MATING_FACE_TO_MANUFACTURER_FOOTPRINT_ORIGIN, DIONEA_POPULATION=FITTED
J12: library part GCT_MEM2052-00-195-00-A, "GCT MEM2052-00-195-00-A microSD push-push connector; official drawing MEM2052 Rev A3, 2022-11-23", DIONEA_PACKAGE=microSD_push-push_1.95mm_8P_CD, DIONEA_FOOTPRINT_SOURCE=GCT_MEM2052_RevA3_RecommendedPCBLayout, DIONEA_FOOTPRINT_STATUS=MANUFACTURER_DRAWING_PATTERN_CONTROLLED, DIONEA_MECHANICAL_ANCHOR=87.000,2.500,180.000, DIONEA_PLACEMENT_DATUM=MATING_FACE_TO_MANUFACTURER_FOOTPRINT_ORIGIN, DIONEA_POPULATION=FITTED
J13: library part Molex_504050-0291_PicoLock-2, "Molex 504050-0291 Pico-Lock 1.50 mm two-circuit right-angle SMT; customer drawing 5040500000-SD PSD 001 Rev B", DIONEA_PACKAGE=Pico-Lock_1.5mm_2P_RA_SMT, DIONEA_FOOTPRINT_SOURCE=Molex_5040500000-SD_PSD001_RevB_RecommendedPattern, DIONEA_FOOTPRINT_STATUS=MANUFACTURER_DRAWING_PATTERN_CONTROLLED, DIONEA_MECHANICAL_ANCHOR=110.000,15.000,270.000, DIONEA_PLACEMENT_DATUM=MATING_FACE_TO_MANUFACTURER_FOOTPRINT_ORIGIN, DIONEA_POPULATION=FITTED
J_MIC1 J_MIC2 J_MIC3 J_MIC4: library part Molex_Pico-Lock_504050-0691_1x06-1MP_P1.50mm_Horizontal, "Molex Pico-Lock series connector, 504050-0691 (http://www.molex.com/pdm_docs/sd/5040500891_sd.pdf), generated with kicad-footprint-generator", DIONEA_PACKAGE=Pico-Lock_1.5_1x06_Right_Angle, DIONEA_FOOTPRINT_SOURCE=Molex_5040500000-SD_PSD000_RevB_RecommendedPattern, DIONEA_FOOTPRINT_STATUS=KICAD_LIBRARY_PATTERN_DRAWING_VERIFIED, DIONEA_PLACEMENT_DATUM=MATING_FACE_TO_MANUFACTURER_FOOTPRINT_ORIGIN, DIONEA_POPULATION=FITTED
  J_MIC1: DIONEA_MECHANICAL_ANCHOR=0.000,42.500,90.000
  J_MIC2: DIONEA_MECHANICAL_ANCHOR=40.000,75.000,0.000
  J_MIC3: DIONEA_MECHANICAL_ANCHOR=92.000,75.000,0.000
  J_MIC4: DIONEA_MECHANICAL_ANCHOR=110.000,54.000,270.000
J_PWR: library part Molex_43045-1202_MicroFit-12_RA, "Molex 43045-1202 Micro-Fit 3.0 2x6 right-angle through-hole; customer drawing SD-43045-001 PSD 001 Rev H1", DIONEA_PACKAGE=Micro-Fit_3.0_2x06_Right_Angle, DIONEA_FOOTPRINT_SOURCE=Molex_SD-43045-001_PSD001_RevH1_PCBLayout, DIONEA_FOOTPRINT_STATUS=MANUFACTURER_DRAWING_PATTERN_CONTROLLED, DIONEA_MECHANICAL_ANCHOR=0.000,22.000,90.000, DIONEA_PLACEMENT_DATUM=MATING_FACE_TO_MANUFACTURER_FOOTPRINT_ORIGIN, DIONEA_POPULATION=FITTED
L1: DIONEA_PACKAGE=1210, DIONEA_COURTYARD_SOURCE=PCB_MAIN_PASSIVE_COURTYARD_RULE_REV_A, DIONEA_COURTYARD_STATUS=CONTROLLED_PAD_ENVELOPE_PLUS_0.25_MM, DIONEA_PLACEMENT_CLASS=UNLOCKED_LAYOUT_CANDIDATE, DIONEA_PLACEMENT_SOURCE=PCB_MAIN_PLACEMENT_REPACK_REV_A, DIONEA_POPULATION=FITTED
Q1 Q2 Q3: library part Nexperia_MMBT3904_SOT23, "Nexperia MMBT3904 SOT23; data sheet v5 2026-04-08 Figure 8 reflow footprint", DIONEA_PACKAGE=SOT23, DIONEA_FOOTPRINT_SOURCE=Nexperia_MMBT3904_v5_2026-04-08_Fig8_ReflowFootprint, DIONEA_FOOTPRINT_STATUS=MANUFACTURER_DRAWING_PATTERN_CONTROLLED, DIONEA_PLACEMENT_CLASS=UNLOCKED_LAYOUT_CANDIDATE, DIONEA_PLACEMENT_SOURCE=PCB_MAIN_PLACEMENT_REPACK_REV_A, DIONEA_POPULATION=FITTED
Q4: library part Vishay_Si1016X_SC-89, "Vishay Si1016X SC-89 6-lead; Application Note 826 recommended minimum pads", DIONEA_PACKAGE=SOT-563_SC-89, DIONEA_FOOTPRINT_SOURCE=Vishay_Si1016X_RevE_AN826_RecommendedMinimumPads, DIONEA_FOOTPRINT_STATUS=MANUFACTURER_DRAWING_PATTERN_CONTROLLED, DIONEA_PLACEMENT_CLASS=UNLOCKED_LAYOUT_CANDIDATE, DIONEA_PLACEMENT_SOURCE=PCB_MAIN_PLACEMENT_REPACK_REV_A, DIONEA_POPULATION=FITTED
TP_BLE_SWD TP_CELL_USB: DIONEA_PACKAGE=POGO_FIXTURE_4P, DIONEA_FOOTPRINT_SOURCE=hardware/PCB_MAIN_MECHANICAL_PLACEMENT_AUTHORITY_REV_A.csv, DIONEA_FOOTPRINT_STATUS=CONTROLLED_MAIN_AUTH_011_POGO_PATTERN, DIONEA_POPULATION=FITTED
TP_CELL_DBG TP_MCU_SWD: DIONEA_PACKAGE=POGO_FIXTURE_5P, DIONEA_FOOTPRINT_SOURCE=hardware/PCB_MAIN_MECHANICAL_PLACEMENT_AUTHORITY_REV_A.csv, DIONEA_FOOTPRINT_STATUS=CONTROLLED_MAIN_AUTH_011_POGO_PATTERN, DIONEA_POPULATION=FITTED
TP_EOL: DIONEA_PACKAGE=POGO_FIXTURE_13P, DIONEA_FOOTPRINT_SOURCE=hardware/PCB_MAIN_MECHANICAL_PLACEMENT_AUTHORITY_REV_A.csv, DIONEA_FOOTPRINT_STATUS=CONTROLLED_MAIN_AUTH_011_POGO_PATTERN, DIONEA_POPULATION=FITTED
U1: library part ST_STM32U585_LQFP100_1L, "ST STM32U585 LQFP100 package 1L; DS13086 Rev 10 Figure 96 footprint example", DIONEA_PACKAGE=LQFP100_14x14, DIONEA_FOOTPRINT_SOURCE=ST_DS13086_Rev10_Figure96_LQFP100_1L, DIONEA_FOOTPRINT_STATUS=MANUFACTURER_DRAWING_PATTERN_CONTROLLED, DIONEA_PLACEMENT_CLASS=UNLOCKED_LAYOUT_CANDIDATE, DIONEA_PLACEMENT_SOURCE=PCB_MAIN_PLACEMENT_REPACK_REV_A, DIONEA_POPULATION=FITTED
U2: library part Winbond_W25Q512JV_PackageF_IPC_Candidate, "Winbond W25Q512JV package F SOIC-16 300 mil; project-controlled KiCad IPC gullwing candidate; assembler DFM required", DIONEA_PACKAGE=SOIC-16_300mil_F, DIONEA_FOOTPRINT_SOURCE=PROJECT_IPC_W25Q512JV_F_KICAD_GULLWING_ASSEMBLER_DFM_REQUIRED, DIONEA_FOOTPRINT_STATUS=PROJECT_IPC_PATTERN_CONTROLLED_ASSEMBLY_DFM_REQUIRED, DIONEA_PLACEMENT_CLASS=UNLOCKED_LAYOUT_CANDIDATE, DIONEA_PLACEMENT_SOURCE=PCB_MAIN_PLACEMENT_REPACK_REV_A, DIONEA_POPULATION=FITTED
U3: library part ST_LIS2DW12_LGA-12L, "ST LIS2DW12 LGA-12L; DS11811 Rev 9 package geometry and TN0018 Rev 8 PCB/stencil rules", DIONEA_PACKAGE=LGA-12_2x2mm, DIONEA_FOOTPRINT_SOURCE=ST_DS11811_Rev9_and_TN0018_Rev8_LGA-12L_Pattern, DIONEA_FOOTPRINT_STATUS=MANUFACTURER_DRAWING_PATTERN_CONTROLLED, DIONEA_PLACEMENT_CLASS=UNLOCKED_LAYOUT_CANDIDATE, DIONEA_PLACEMENT_SOURCE=PCB_MAIN_PLACEMENT_REPACK_REV_A, DIONEA_POPULATION=FITTED
U4: library part STTS22H_UDFN-6L, "ST STTS22H UDFN-6L 2x2 mm; DS12606 Rev8 Figures 10 and 11", DIONEA_PACKAGE=UDFN-6L_2x2mm, DIONEA_FOOTPRINT_SOURCE=ST_DS12606_Rev8_Fig10_11, DIONEA_FOOTPRINT_STATUS=MANUFACTURER_DRAWING_PATTERN_CONTROLLED, DIONEA_PLACEMENT_CLASS=UNLOCKED_LAYOUT_CANDIDATE, DIONEA_PLACEMENT_SOURCE=PCB_MAIN_PLACEMENT_REPACK_REV_A, DIONEA_POPULATION=FITTED
U5: library part LT6000_DCB-7, "Analog Devices LT6000 DCB 6-lead DFN 2x3 mm; LTC DWG 05-08-1715", DIONEA_PACKAGE=DFN-6_DCB_2x3mm, DIONEA_FOOTPRINT_SOURCE=ADI_LT6000_600012fa_LTC_DWG_05-08-1715, DIONEA_FOOTPRINT_STATUS=MANUFACTURER_DRAWING_PATTERN_CONTROLLED, DIONEA_PLACEMENT_CLASS=UNLOCKED_LAYOUT_CANDIDATE, DIONEA_PLACEMENT_SOURCE=PCB_MAIN_PLACEMENT_REPACK_REV_A, DIONEA_POPULATION=FITTED
U6: library part TI_DBV0005A_SOT23-5, "TI DBV0005A 5-pin SOT-23; 4214839/K 08/2024 example board layout", DIONEA_PACKAGE=SOT-23-5_DBV, DIONEA_FOOTPRINT_SOURCE=TI_DBV0005A_4214839K_2024-08_RecommendedLandPattern, DIONEA_FOOTPRINT_STATUS=MANUFACTURER_DRAWING_PATTERN_CONTROLLED, DIONEA_PLACEMENT_CLASS=UNLOCKED_LAYOUT_CANDIDATE, DIONEA_PLACEMENT_SOURCE=PCB_MAIN_PLACEMENT_REPACK_REV_A, DIONEA_POPULATION=FITTED
U7 U13 U16: library part TI_PW0024A_TSSOP24, "TI PW0024A 24-pin TSSOP; 4220208/A 02/2017 example board layout", DIONEA_PACKAGE=TSSOP-24_PW, DIONEA_FOOTPRINT_SOURCE=TI_PW0024A_4220208A_2017-02_RecommendedLandPattern, DIONEA_FOOTPRINT_STATUS=MANUFACTURER_DRAWING_PATTERN_CONTROLLED, DIONEA_PLACEMENT_CLASS=UNLOCKED_LAYOUT_CANDIDATE, DIONEA_PLACEMENT_SOURCE=PCB_MAIN_PLACEMENT_REPACK_REV_A, DIONEA_POPULATION=FITTED
U8: library part Quectel_BG95-M3_LGA-102, "Quectel BG95-M3 LGA-102; recommended footprint in BG95 Series Hardware Design V1.8 Figure 46", DIONEA_PACKAGE=LGA-102_23.6x19.9mm, DIONEA_FOOTPRINT_SOURCE=Quectel_BG95_HW_Design_V1.8_Figure46, DIONEA_FOOTPRINT_STATUS=MANUFACTURER_DRAWING_PATTERN_CONTROLLED, DIONEA_MECHANICAL_ANCHOR=24.000,52.000,0.000, DIONEA_PLACEMENT_DATUM=MANUFACTURER_FOOTPRINT_ORIGIN, DIONEA_POPULATION=FITTED
U9: library part u-blox_MAX-M10S_LCC-18, "u-blox MAX-M10S LCC-18; UBX-20053088 R05 Figure 30 and Table 44 copper/mask pattern", DIONEA_PACKAGE=LCC-18_9.7x10.1mm, DIONEA_FOOTPRINT_SOURCE=u-blox_UBX-20053088_R05_Fig30_Table44, DIONEA_FOOTPRINT_STATUS=MANUFACTURER_DRAWING_PATTERN_CONTROLLED, DIONEA_MECHANICAL_ANCHOR=53.500,58.000,0.000, DIONEA_PLACEMENT_DATUM=MANUFACTURER_FOOTPRINT_ORIGIN, DIONEA_POPULATION=FITTED
U10: library part Ebyte_E22-M22S_Castellated-22, "Ebyte E22-170/400/900M22S 14x20 mm castellated module; user manual v1.2 section 3.2 bottom-pad pattern", DIONEA_PACKAGE=SMD_20x14_22P_1.27mm, DIONEA_FOOTPRINT_SOURCE=Ebyte_E22-M_v1.2_2026-02-06_Section3.2, DIONEA_FOOTPRINT_STATUS=MANUFACTURER_DRAWING_PATTERN_CONTROLLED, DIONEA_MECHANICAL_ANCHOR=74.000,55.000,0.000, DIONEA_PLACEMENT_DATUM=MANUFACTURER_FOOTPRINT_ORIGIN, DIONEA_POPULATION=FITTED
U11: library part Raytac_MDBT50Q-P1MV2, "Raytac MDBT50Q-P1MV2; Footprint Design Guide 230606 solder-pad and RF-layout control", DIONEA_PACKAGE=nRF52840_SMD_10.5x15.5_61P_PCB_antenna, DIONEA_FOOTPRINT_SOURCE=Raytac_MDBT50Q_Footprint_Design_Guide_230606, DIONEA_FOOTPRINT_STATUS=MANUFACTURER_DRAWING_PATTERN_CONTROLLED, DIONEA_MECHANICAL_ANCHOR=102.250,35.250,270.000, DIONEA_PLACEMENT_DATUM=MANUFACTURER_FOOTPRINT_ORIGIN, DIONEA_POPULATION=FITTED
U14 U15: library part ST_ESDALC6V1-5P6_SOT666, "ST ESDALC6V1-5P6 SOT666; data sheet Rev 3 Figure 14 footprint", DIONEA_PACKAGE=SOT666_1.6x1.6mm, DIONEA_FOOTPRINT_SOURCE=ST_ESDALC6V1-5P6_Rev3_Figure14_SOT666_Footprint, DIONEA_FOOTPRINT_STATUS=MANUFACTURER_DRAWING_PATTERN_CONTROLLED, DIONEA_PLACEMENT_CLASS=UNLOCKED_LAYOUT_CANDIDATE, DIONEA_PLACEMENT_SOURCE=PCB_MAIN_PLACEMENT_REPACK_REV_A, DIONEA_POPULATION=FITTED
U17: library part TI_PW0014A_TSSOP14, "TI PW0014A 14-pin TSSOP; 4220202/B 12/2023 example board layout", DIONEA_PACKAGE=TSSOP-14_PW, DIONEA_FOOTPRINT_SOURCE=TI_PW0014A_4220202B_2023-12_RecommendedLandPattern, DIONEA_FOOTPRINT_STATUS=MANUFACTURER_DRAWING_PATTERN_CONTROLLED, DIONEA_PLACEMENT_CLASS=UNLOCKED_LAYOUT_CANDIDATE, DIONEA_PLACEMENT_SOURCE=PCB_MAIN_PLACEMENT_REPACK_REV_A, DIONEA_POPULATION=FITTED
U18: library part TI_DRL0006A_SOT6, "TI DRL0006A 6-pin SOT-5X3; 4223266/F 11/2024 example board layout", DIONEA_PACKAGE=SOT-5X3-6_DRL, DIONEA_FOOTPRINT_SOURCE=TI_DRL0006A_4223266F_2024-11_RecommendedLandPattern, DIONEA_FOOTPRINT_STATUS=MANUFACTURER_DRAWING_PATTERN_CONTROLLED, DIONEA_PLACEMENT_CLASS=UNLOCKED_LAYOUT_CANDIDATE, DIONEA_PLACEMENT_SOURCE=PCB_MAIN_PLACEMENT_REPACK_REV_A, DIONEA_POPULATION=FITTED
U19 U20 U21 U22 U23 U24 U27: library part TI_DQA0010A_USON10, "TI DQA0010A 10-pin USON; 4220328/A 12/2015 example board layout", DIONEA_PACKAGE=USON-10_DQA, DIONEA_FOOTPRINT_SOURCE=TI_DQA0010A_4220328A_2015-12_RecommendedLandPattern, DIONEA_FOOTPRINT_STATUS=MANUFACTURER_DRAWING_PATTERN_CONTROLLED, DIONEA_PLACEMENT_CLASS=UNLOCKED_LAYOUT_CANDIDATE, DIONEA_PLACEMENT_SOURCE=PCB_MAIN_PLACEMENT_REPACK_REV_A, DIONEA_POPULATION=FITTED
U25 U26: library part TI_DRT0003A_IPC_Candidate, "TI DRT0003A 3-pin SOT-9X3; project-controlled KiCad package-derived candidate; assembler DFM and USB SI review required", DIONEA_PACKAGE=SOT-9X3_DRT, DIONEA_FOOTPRINT_SOURCE=PROJECT_IPC_TI_DRT0003A_KICAD_DRT3_ASSEMBLER_DFM_REQUIRED, DIONEA_FOOTPRINT_STATUS=PROJECT_IPC_PATTERN_CONTROLLED_ASSEMBLY_DFM_REQUIRED, DIONEA_PLACEMENT_CLASS=UNLOCKED_LAYOUT_CANDIDATE, DIONEA_PLACEMENT_SOURCE=PCB_MAIN_PLACEMENT_REPACK_REV_A, DIONEA_POPULATION=FITTED
X1: library part SiT1552_JE_CSP-4, "SiTime SiT1552 JE 4LD 1.54x0.84 mm CSP; POD-35 Rev A recommended land pattern", DIONEA_PACKAGE=CSP-4_1.5x0.8mm, DIONEA_FOOTPRINT_SOURCE=SiTime_SiT1552_Rev1.43_POD-35_RevA, DIONEA_FOOTPRINT_STATUS=MANUFACTURER_DRAWING_PATTERN_CONTROLLED, DIONEA_PLACEMENT_CLASS=UNLOCKED_LAYOUT_CANDIDATE, DIONEA_PLACEMENT_SOURCE=PCB_MAIN_PLACEMENT_REPACK_REV_A, DIONEA_POPULATION=FITTED

## Via types
v1: diameter 0.5, hole 0.3, F.Cu to B.Cu, tented both sides, 304 vias

## Nets (pads, with @x,y where several pads share a name; then routed paths per layer and width w, separated by ;. In a path a pad name is that pad's centre, name@x,y a point inside that pad or via, vN(x,y) a via of type N, cw(c..) or ccw(c..) an arc to the next point about the centre after c; other vN are vias at no path point)
1V8_MIC: C20.1 C27.1 C30.1 C31.1 J_MIC1.1 J_MIC2.1 J_MIC3.1 J_MIC4.1 J_PWR.5 TP_EOL.4 U7.1 U7.2 U17.14 U18.1 U18.5
3V3_DIGITAL: C1.1 C2.1 C3.1 C4.1 C5.1 C6.1 C7.1 C8.1 C9.1 C12.1 C13.1 C19.1 C21.1 C22.1 C23.1 C24.1 C25.1 C26.1 C28.1 C29.1 C32.1 C34.1 C35.1 C49.1 C60.1 C61.1 C62.1 C66.1 C67.1 C71.1 C72.1 C73.1 C74.1 C75.1 D11.1 J12.4 J_PWR.3 R1.1 R4.1 R6.1 R7.1 R13.1 R14.1 R28.1 R32.1 R33.1 R44.1 R48.1 R49.1 R67.1 R68.1 R76.1 R78.1 R85.1 R86.1 R87.1 R88.1 R89.1 R90.1 R99.1 TP_BLE_SWD.1 TP_EOL.2 TP_MCU_SWD.1 U1.6 U1.11 U1.20 U1.21 U1.27 U1.47 U1.51 U1.73 U1.75 U1.100 U2.2 U2.3 U3.2 U3.9 U3.10 U4.3 U6.5 U7.23 U7.24 U9.7 U9.8 U10.9 U11.28 U11.30 U13.8 U16.23 U16.24 U18.6 X1.3
3V8_MODEM: FB1.1 J_PWR.1 R42.1 TP_EOL.3
3V8_MODEM_BB: C36.1 C37.1 C38.1 C39.1 C40.1 C41.1 C42.1 C43.1 D1.1 FB1.2 U8.32 U8.33
3V8_MODEM_RF: C44.1 C45.1 C46.1 C47.1 D2.1 R42.2 U8.52 U8.53
AAD_CFG: U1.77 U7.16
AAD_CFG_1V8_FANOUT: J_MIC1.6 J_MIC2.6 J_MIC3.6 J_MIC4.6 R18.2 U19.5 U20.5 U21.5 U22.5
AAD_CFG_1V8_U7: R18.1 U7.8
ACCEL_INT: U1.63 U3.12
BLE_DFU_REQ: R76.2 U1.34 U11.39
BLE_EN: R77.1 U1.5 U6.2
BLE_RX_U1: R74.2 U1.45 | length 50.6
  F.Cu w0.15: U1.45@59.135,37.325 59.135,38.325 62.135,38.325 62.635,37.825 62.885,37.825 63.635,37.075 64.135,37.075 64.635,36.575 68.635,36.575 68.885,36.325 69.385,36.325 69.885,35.825 96.135,35.825 98.385,33.575 99.135,33.575 99.385,33.825 106.135,33.825 R74.2@106.135,33.325
BLE_RX_U11: R74.1 U11.22
BLE_TX_U1: R75.1 U1.44
BLE_TX_U11: R75.2 U11.24
BOOT0: R2.1 TP_EOL.9 U1.94 | length 19
  F.Cu w0.15: U1.94@52.635,52.825 52.635,53.825 v1(52.885,53.825) ; R2.1@65.135,43.575 65.135,44.075 65.385,44.075 v1(65.385,44.325)
  B.Cu w0.15: v1(52.885,53.825) 53.885,53.825 54.135,54.075 54.635,54.075 56.635,52.075 56.885,52.075 64.135,44.825 65.135,44.825 65.385,44.575 v1(65.385,44.325)
CELL_DBG_RXD_TP: R37.1 TP_CELL_DBG.3 U27.2
CELL_DBG_RXD_U8: R37.2 U8.22
CELL_DBG_TXD_TP: R36.2 TP_CELL_DBG.2 U27.1
CELL_DBG_TXD_U8: R36.1 U8.23
CELL_DBG_VREF_TP: R41.2 U27.4
CELL_DTR_U16: R29.1 U1.61 U16.16
CELL_PWRKEY_CMD: R24.1 U1.58
CELL_RESET_N_CMD: R26.1 U1.59